# Altium PCB CellForge_PCB.PcbDoc (part 1 of 4)
Units mm, origin at the board's own origin, x right, y up, seen from the top; angles counter-clockwise.
Board outline 170.5 x 170.5 mm, 4 copper layers (Top Layer, Solid GND Plane, Power Distribution + signals, Bottom Layer), stack 1.586 mm thick; 199 components, 117 nets, 719 pads, 464 vias.
Unrouted connection lines stored in the file: 8.
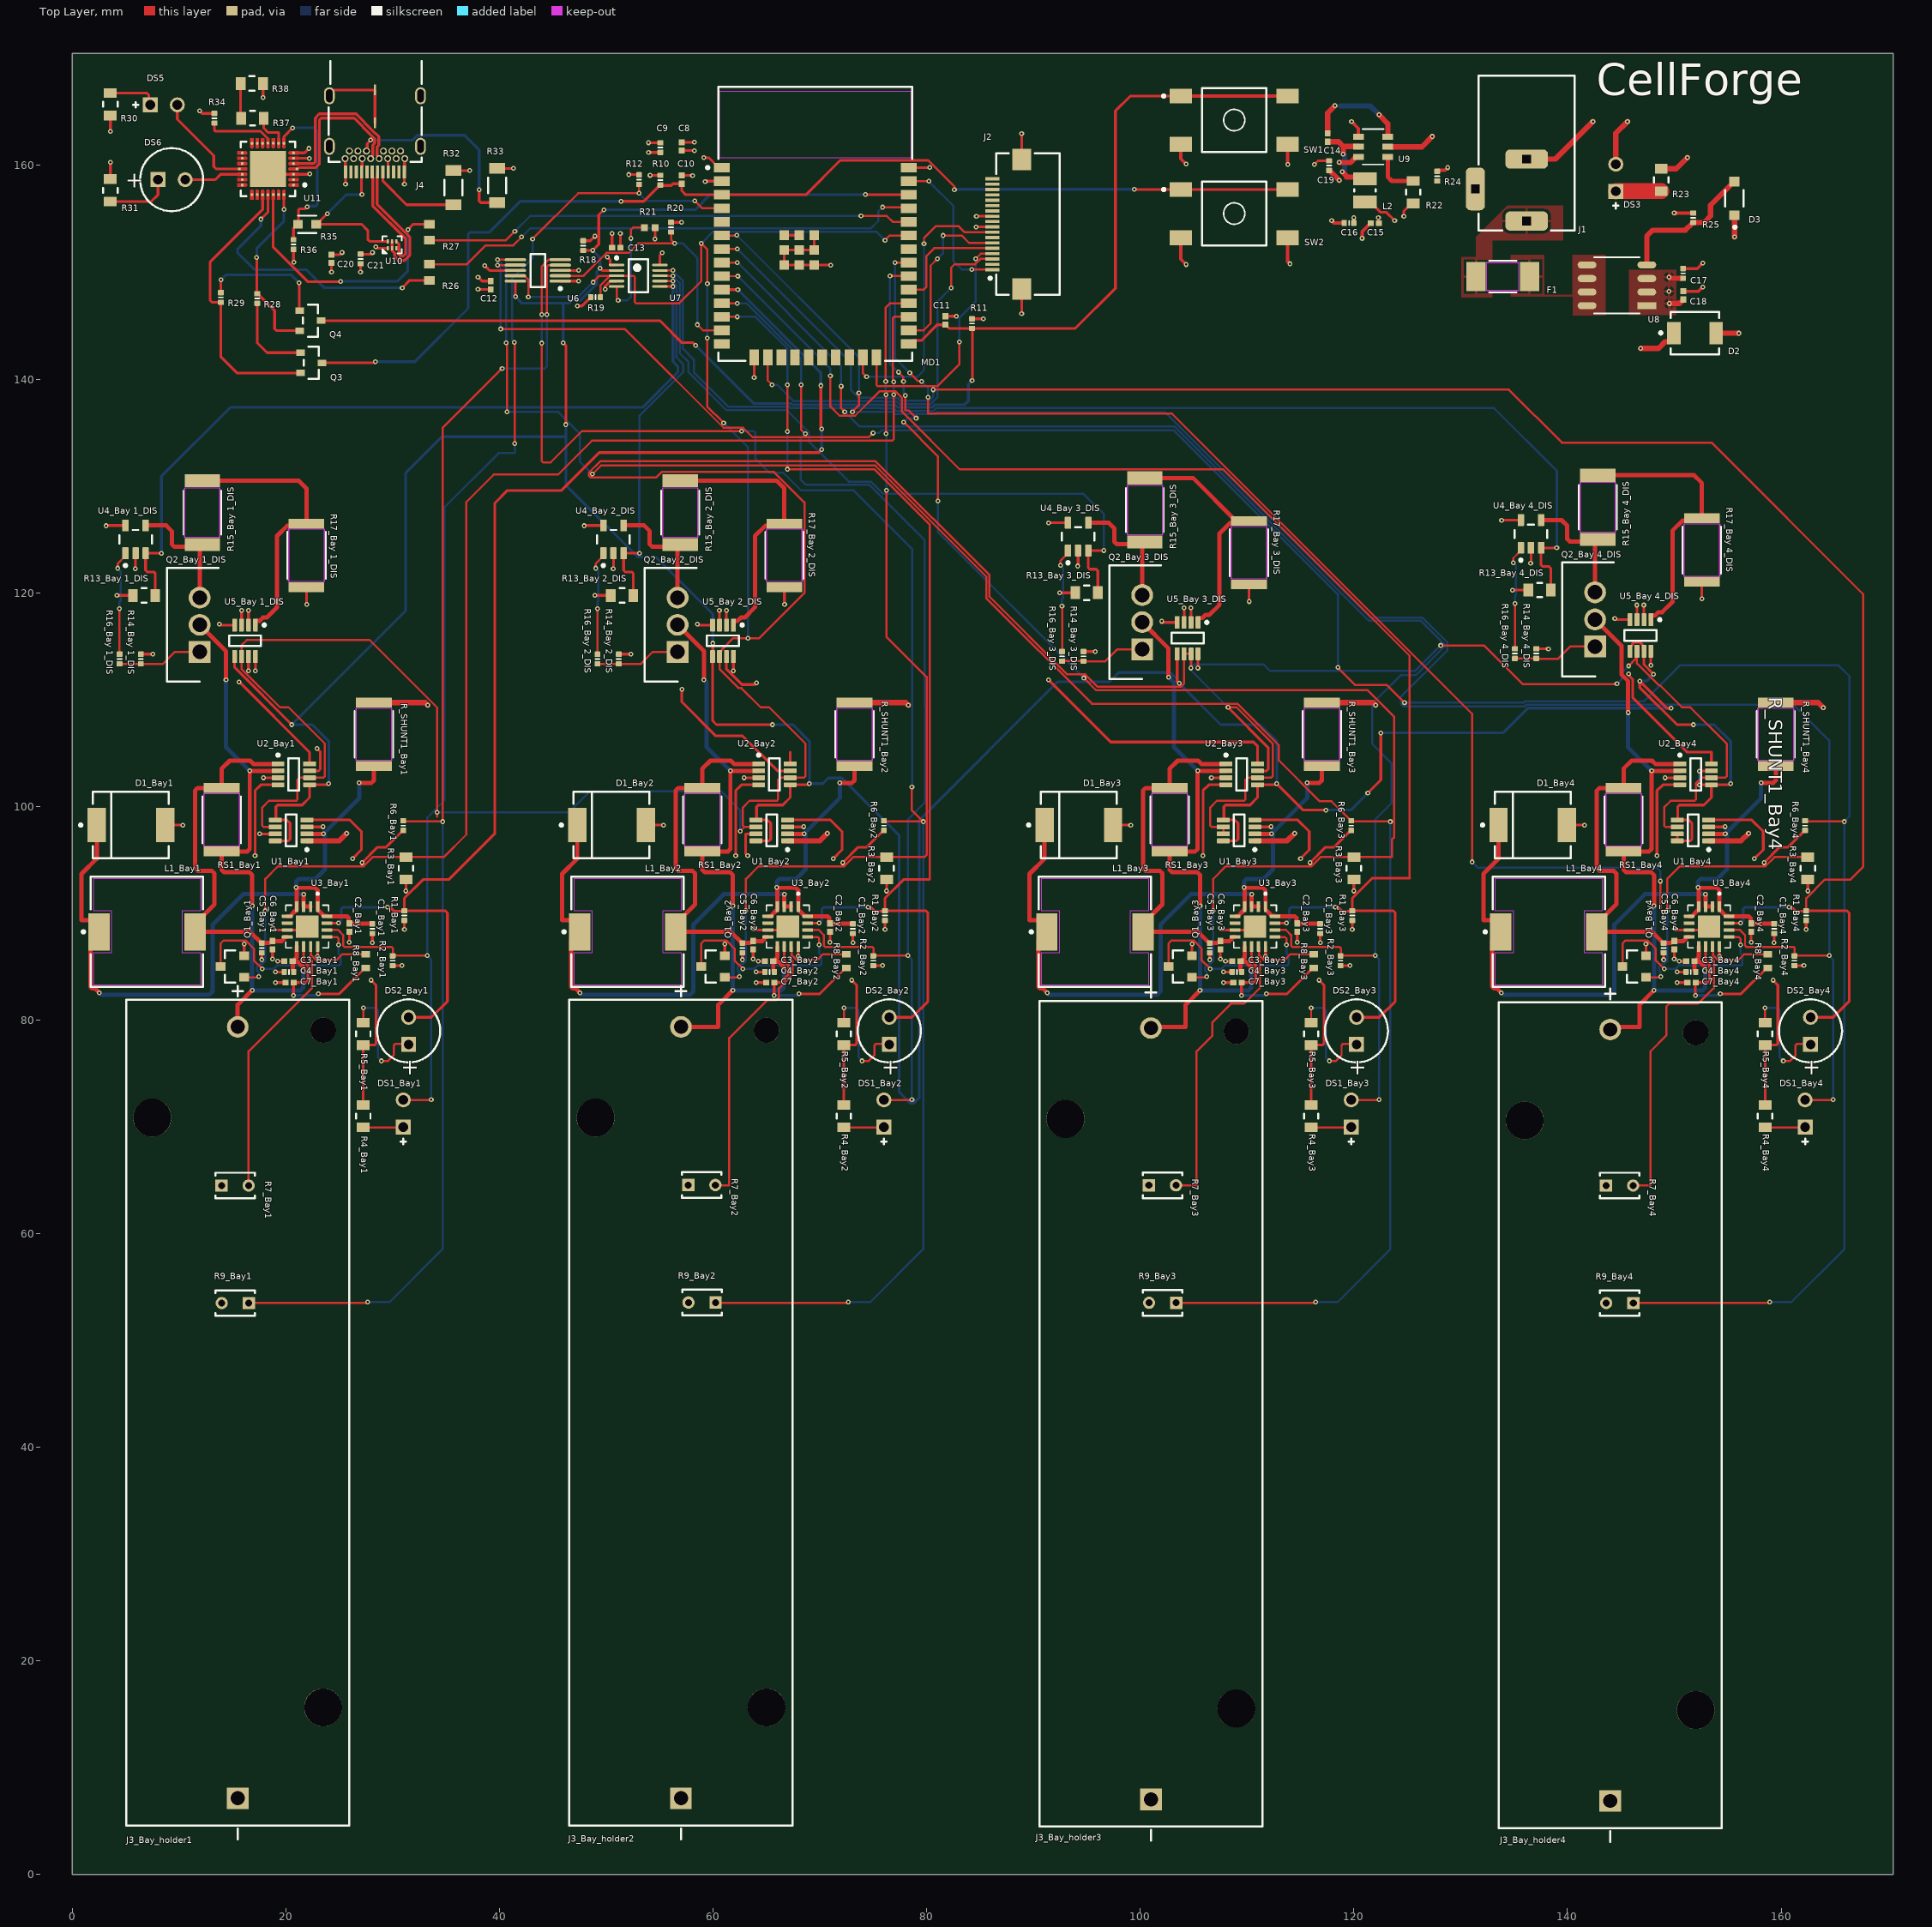
[diagram p0: Top Layer view]
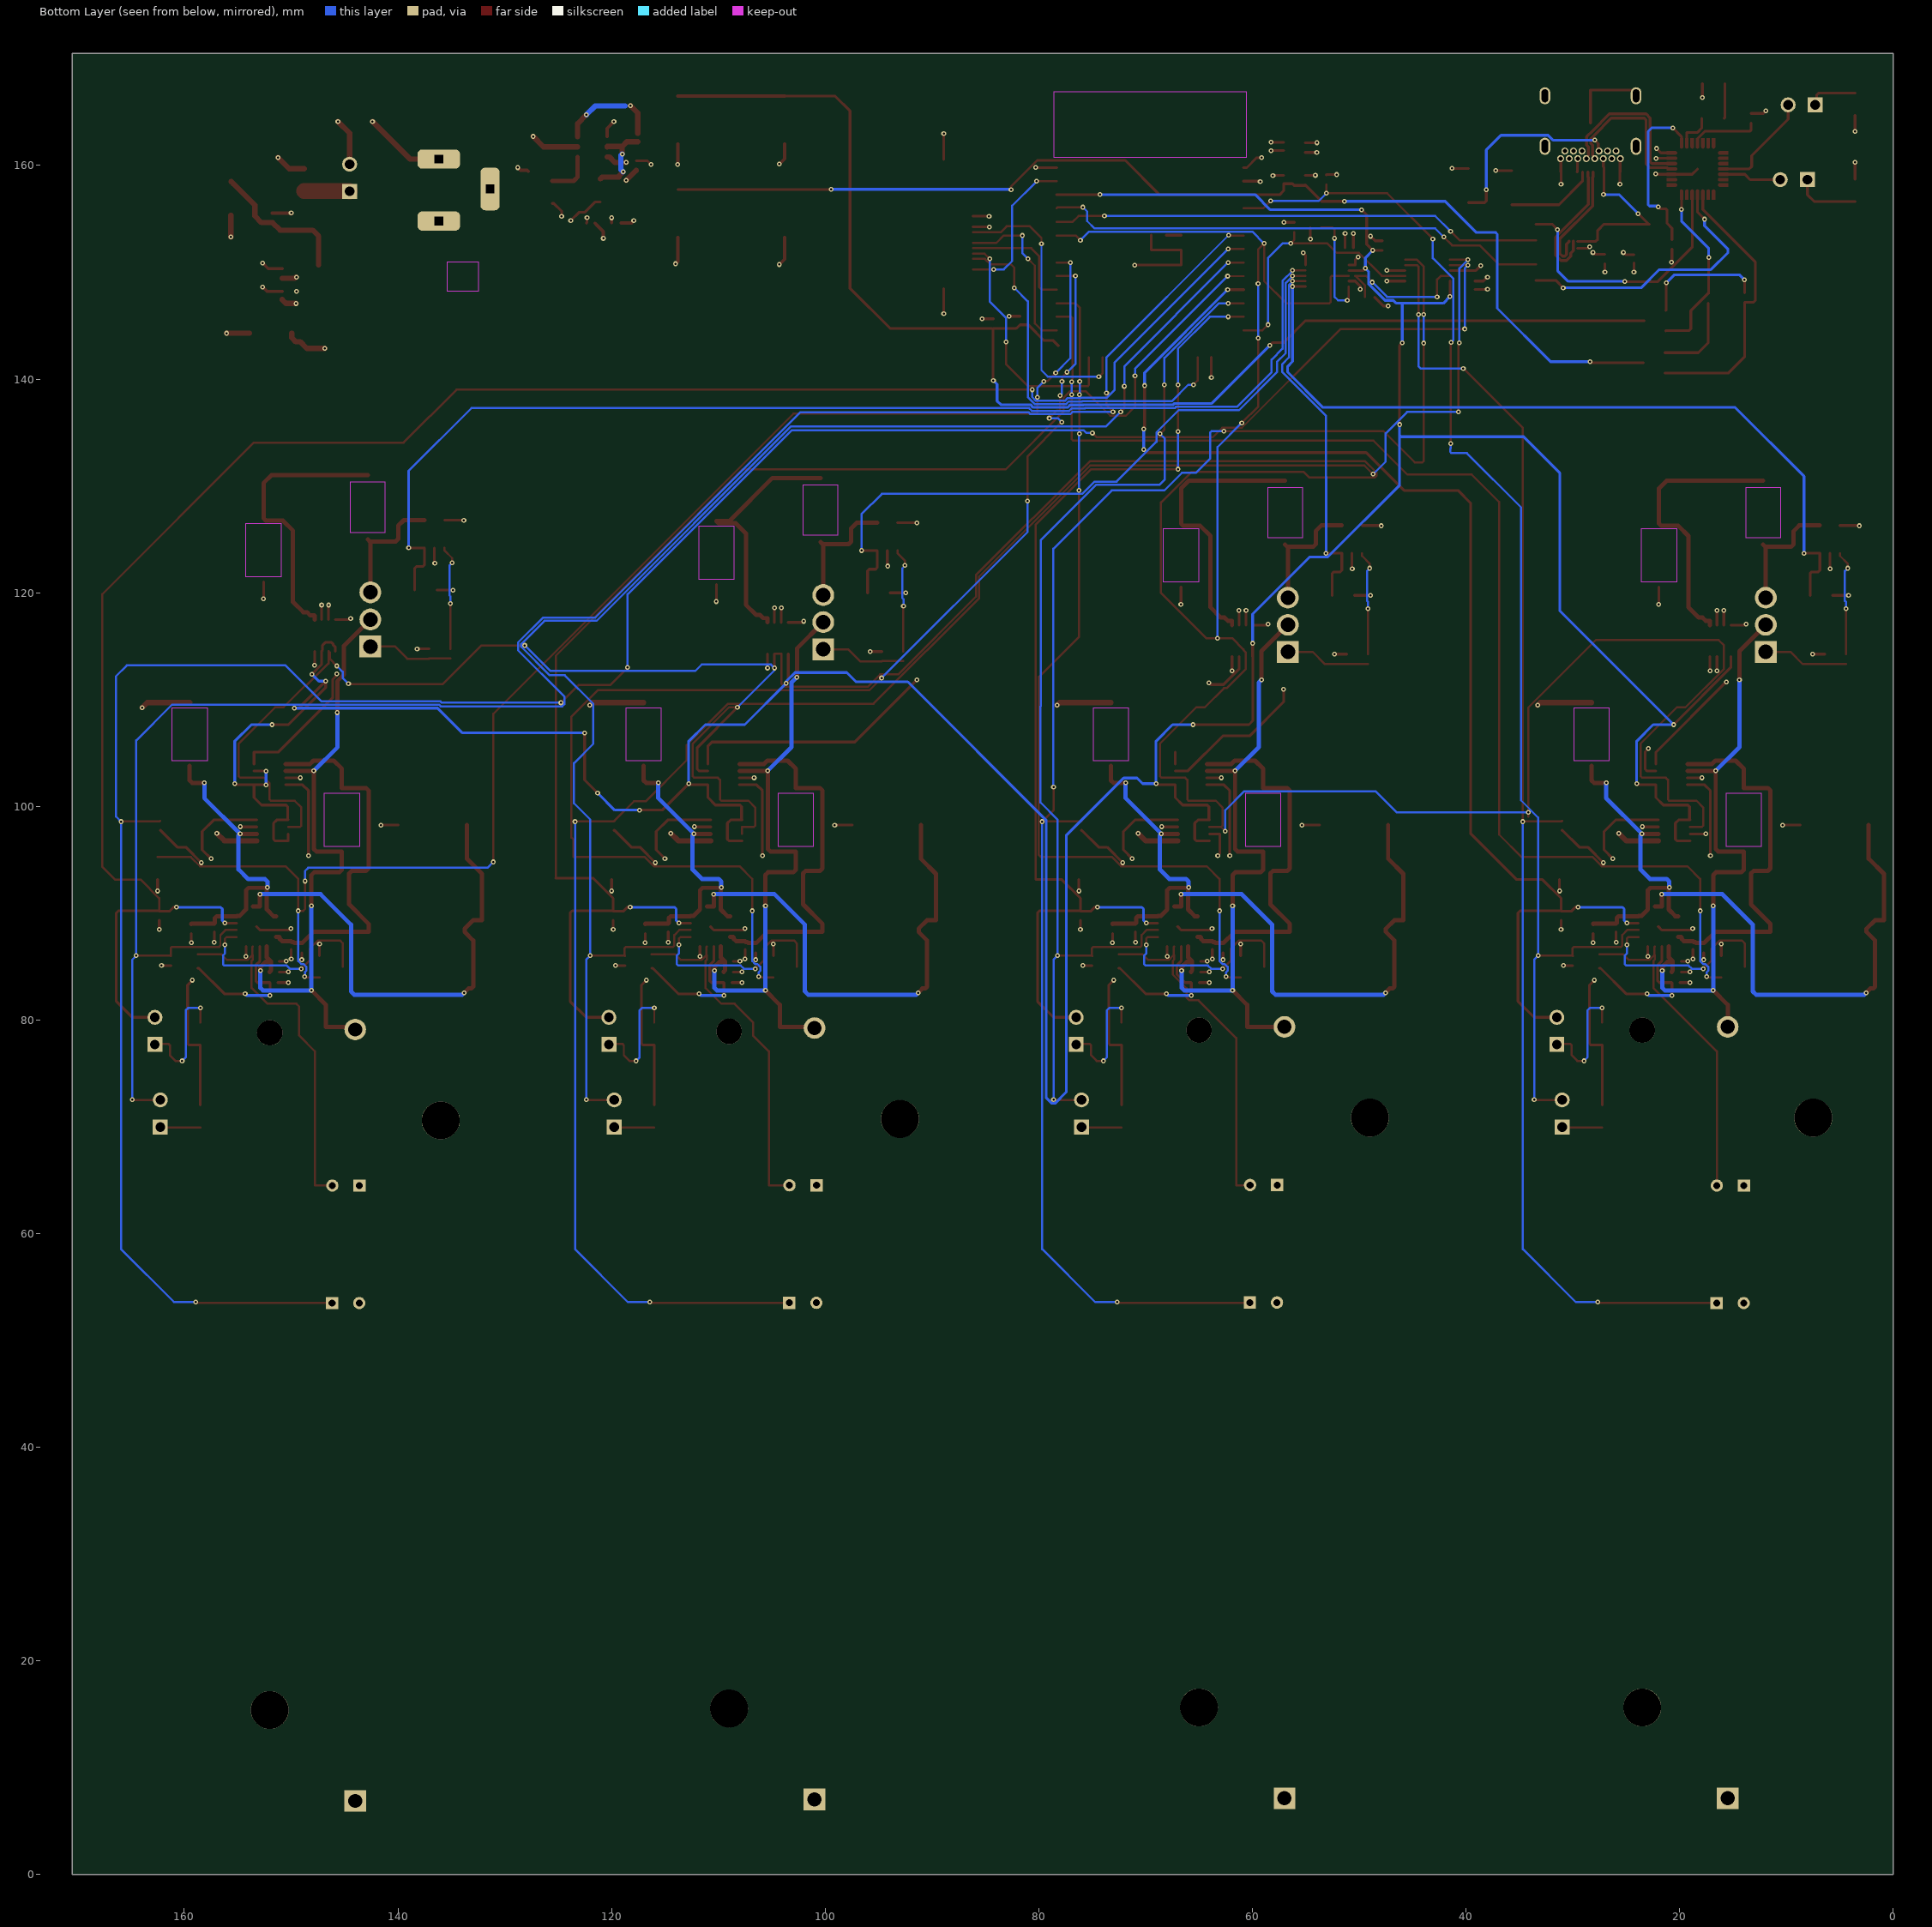
[diagram p1: Bottom Layer view, seen from below]
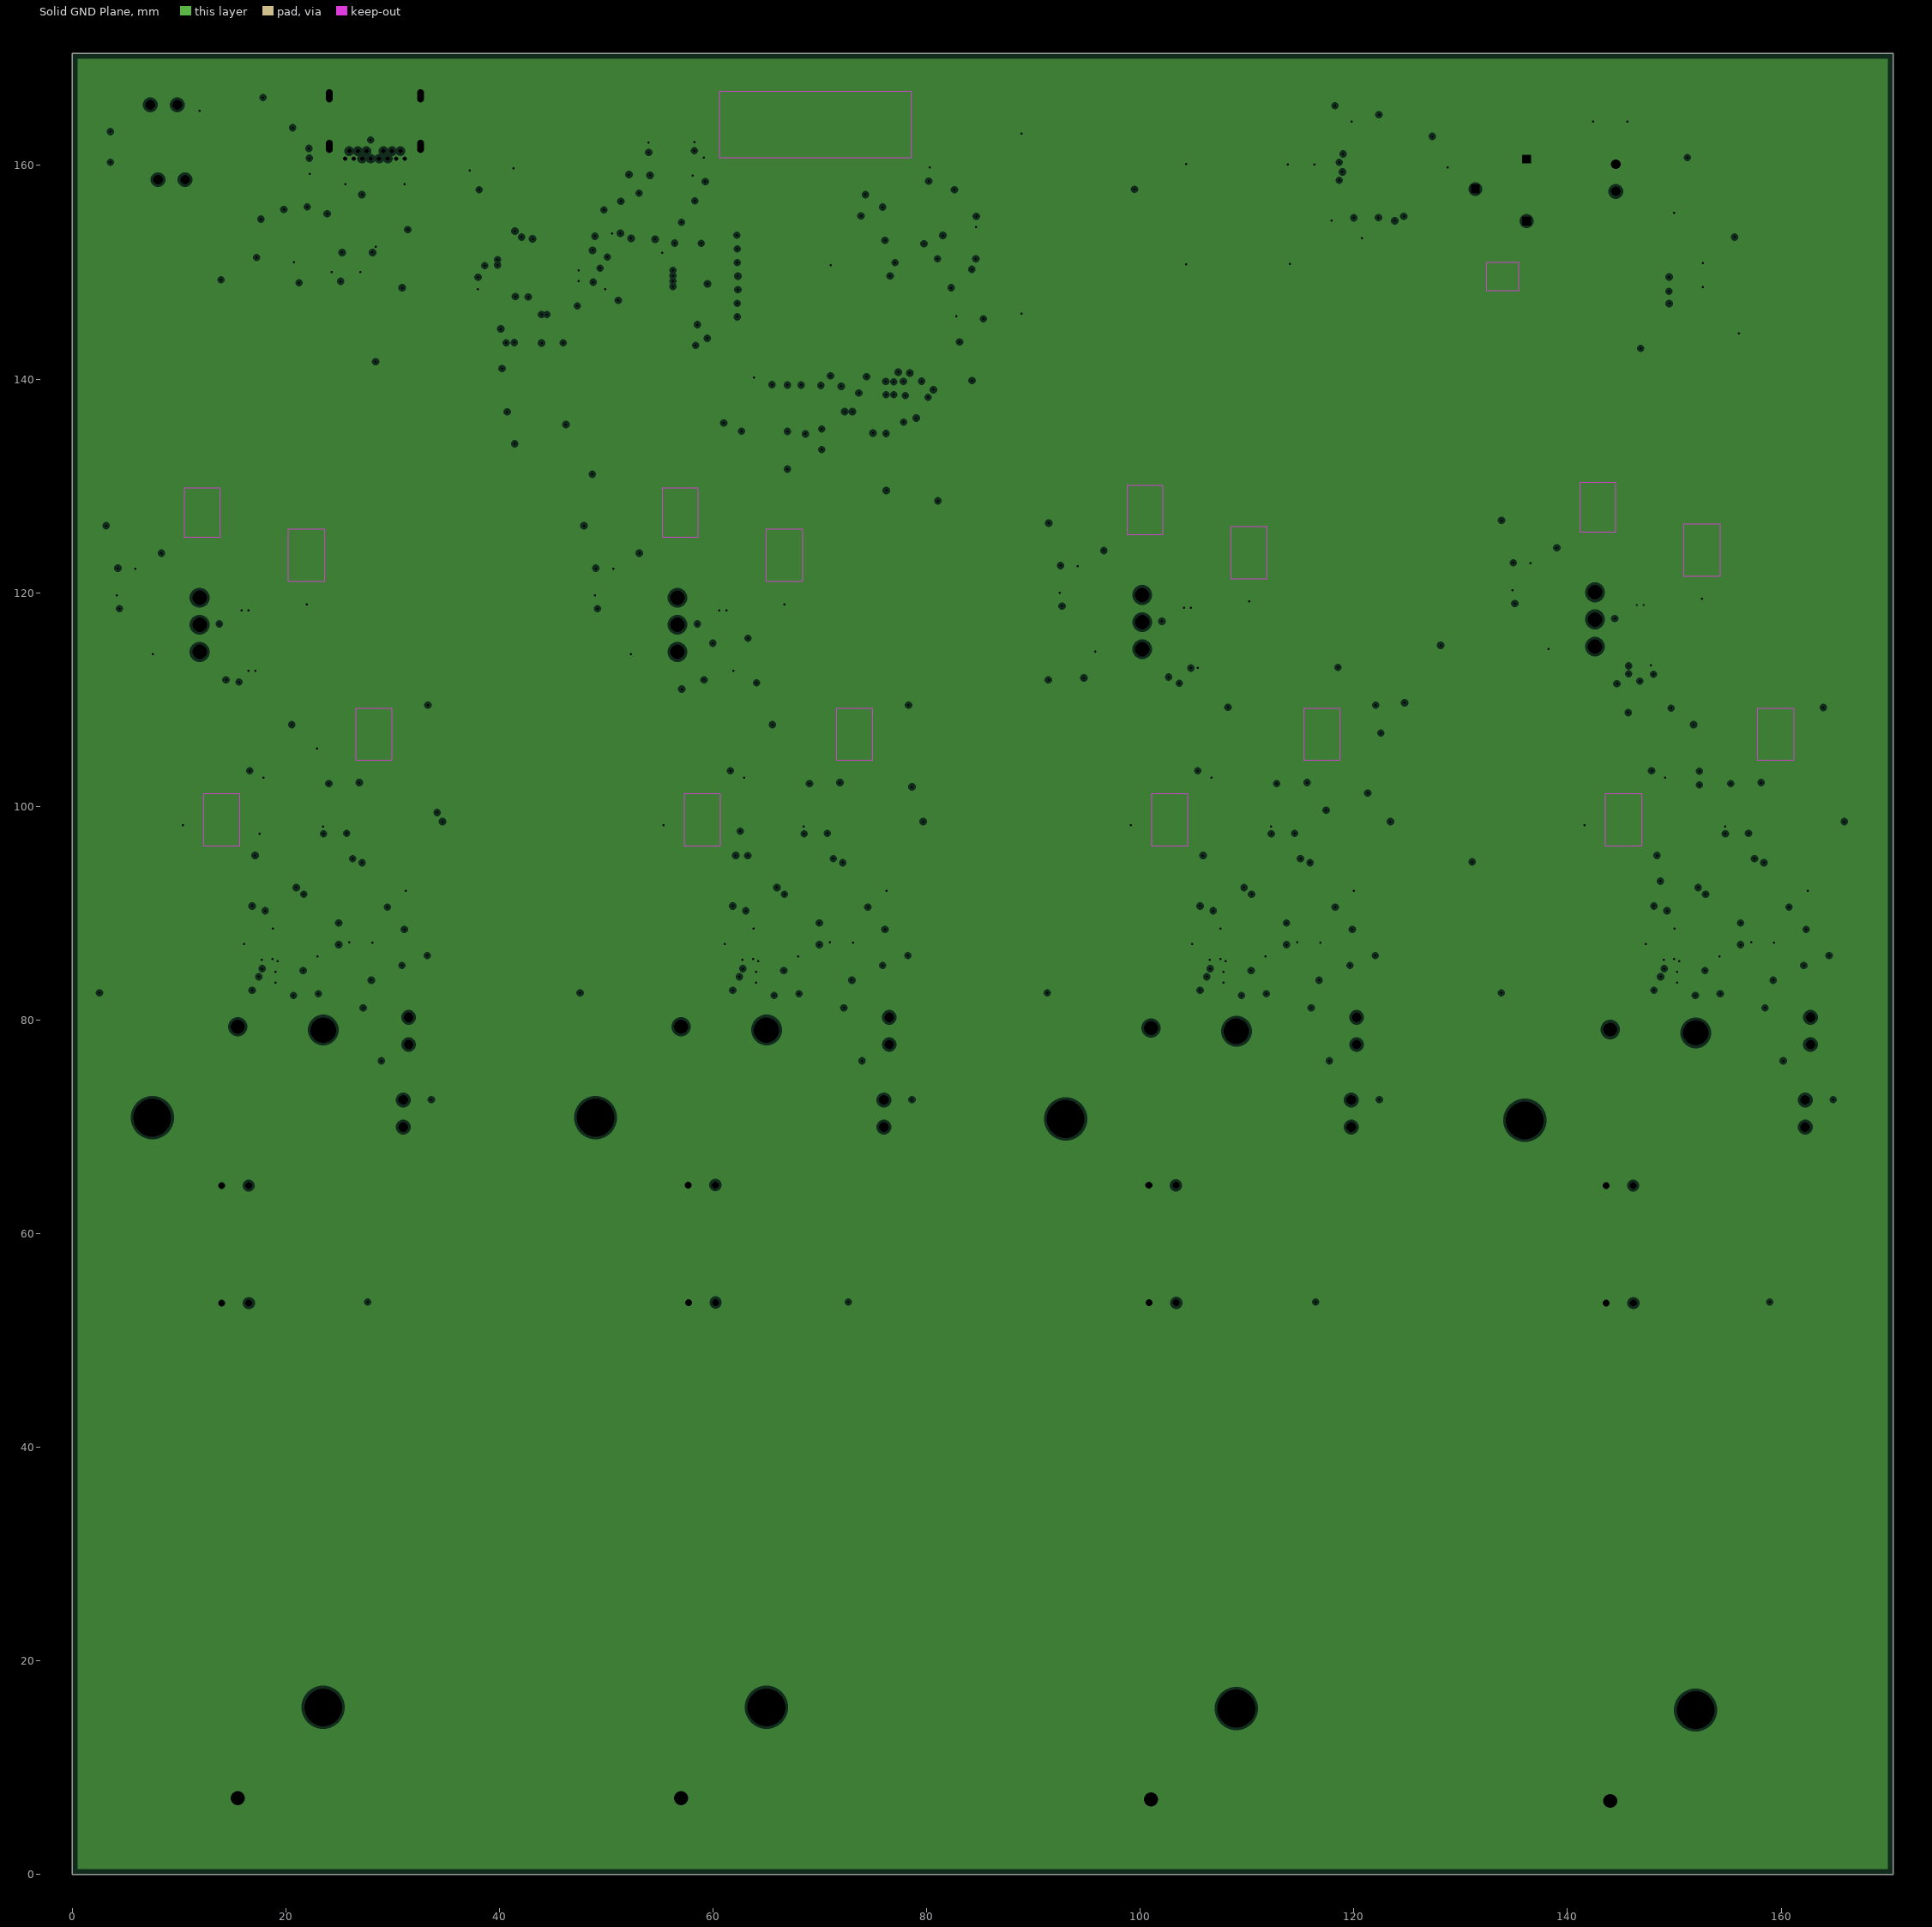
[diagram p2: Solid GND Plane, clearances drawn from the general rule]
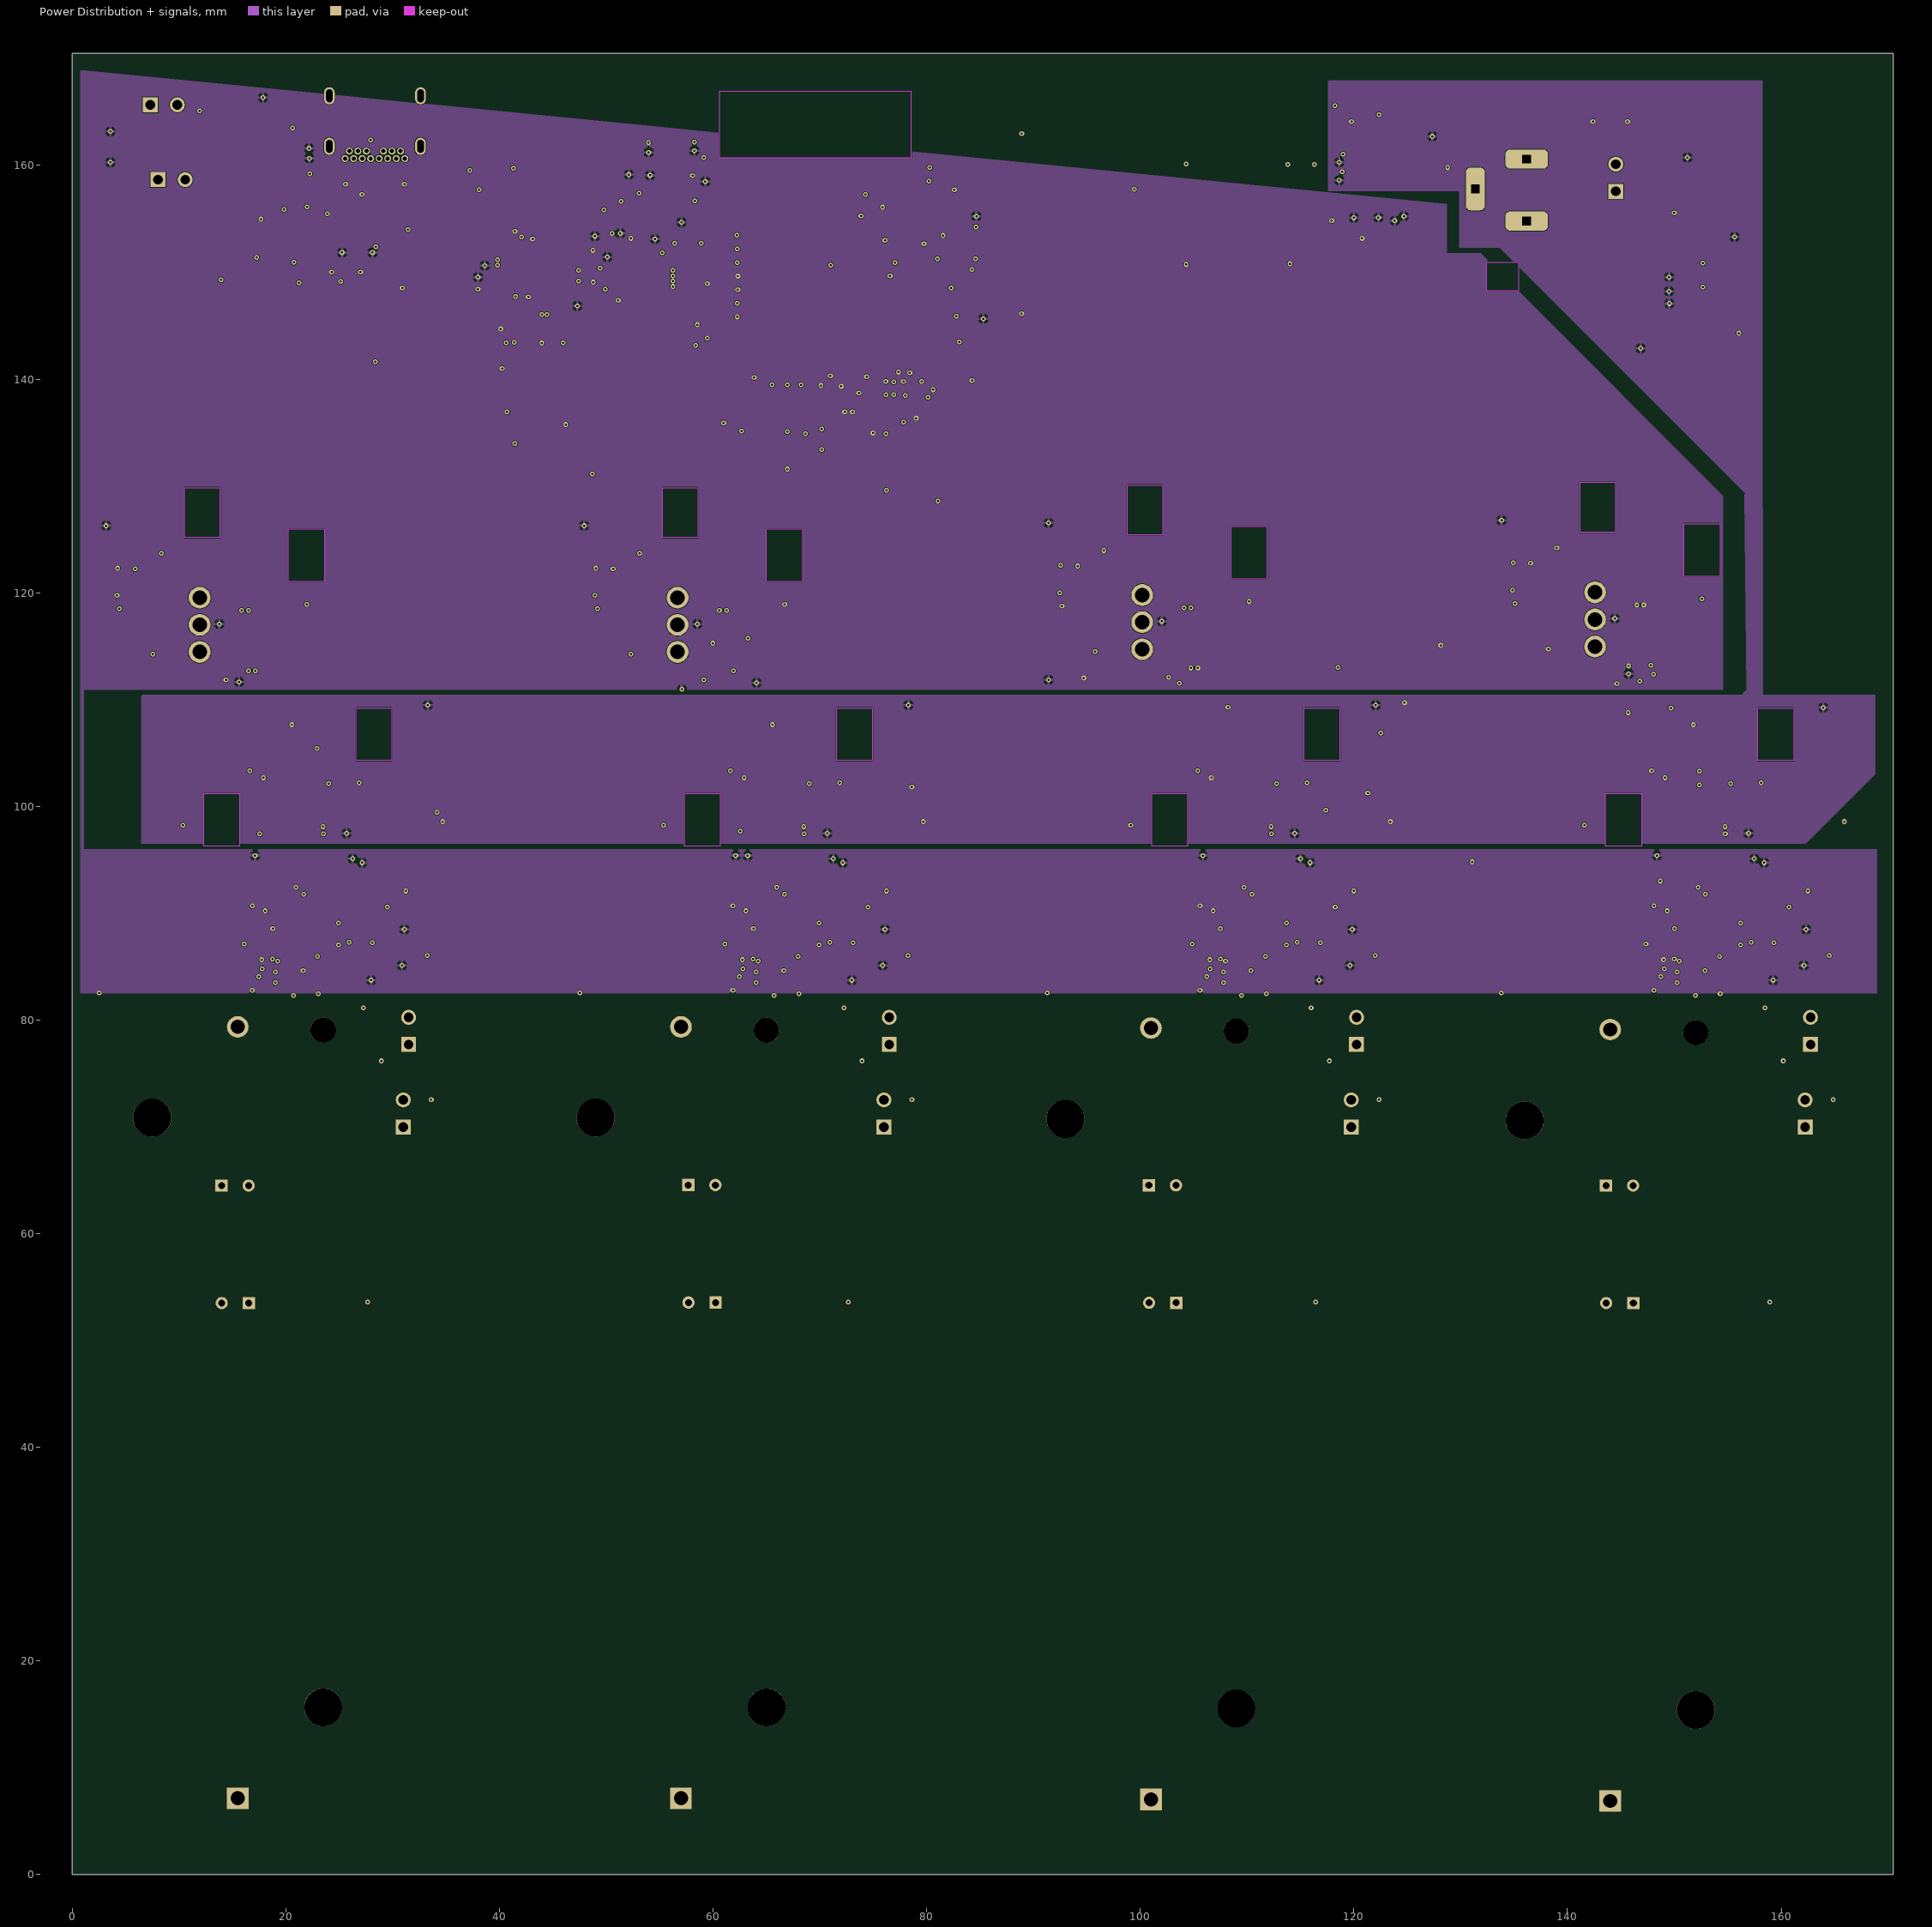
[diagram p3: Power Distribution + signals]
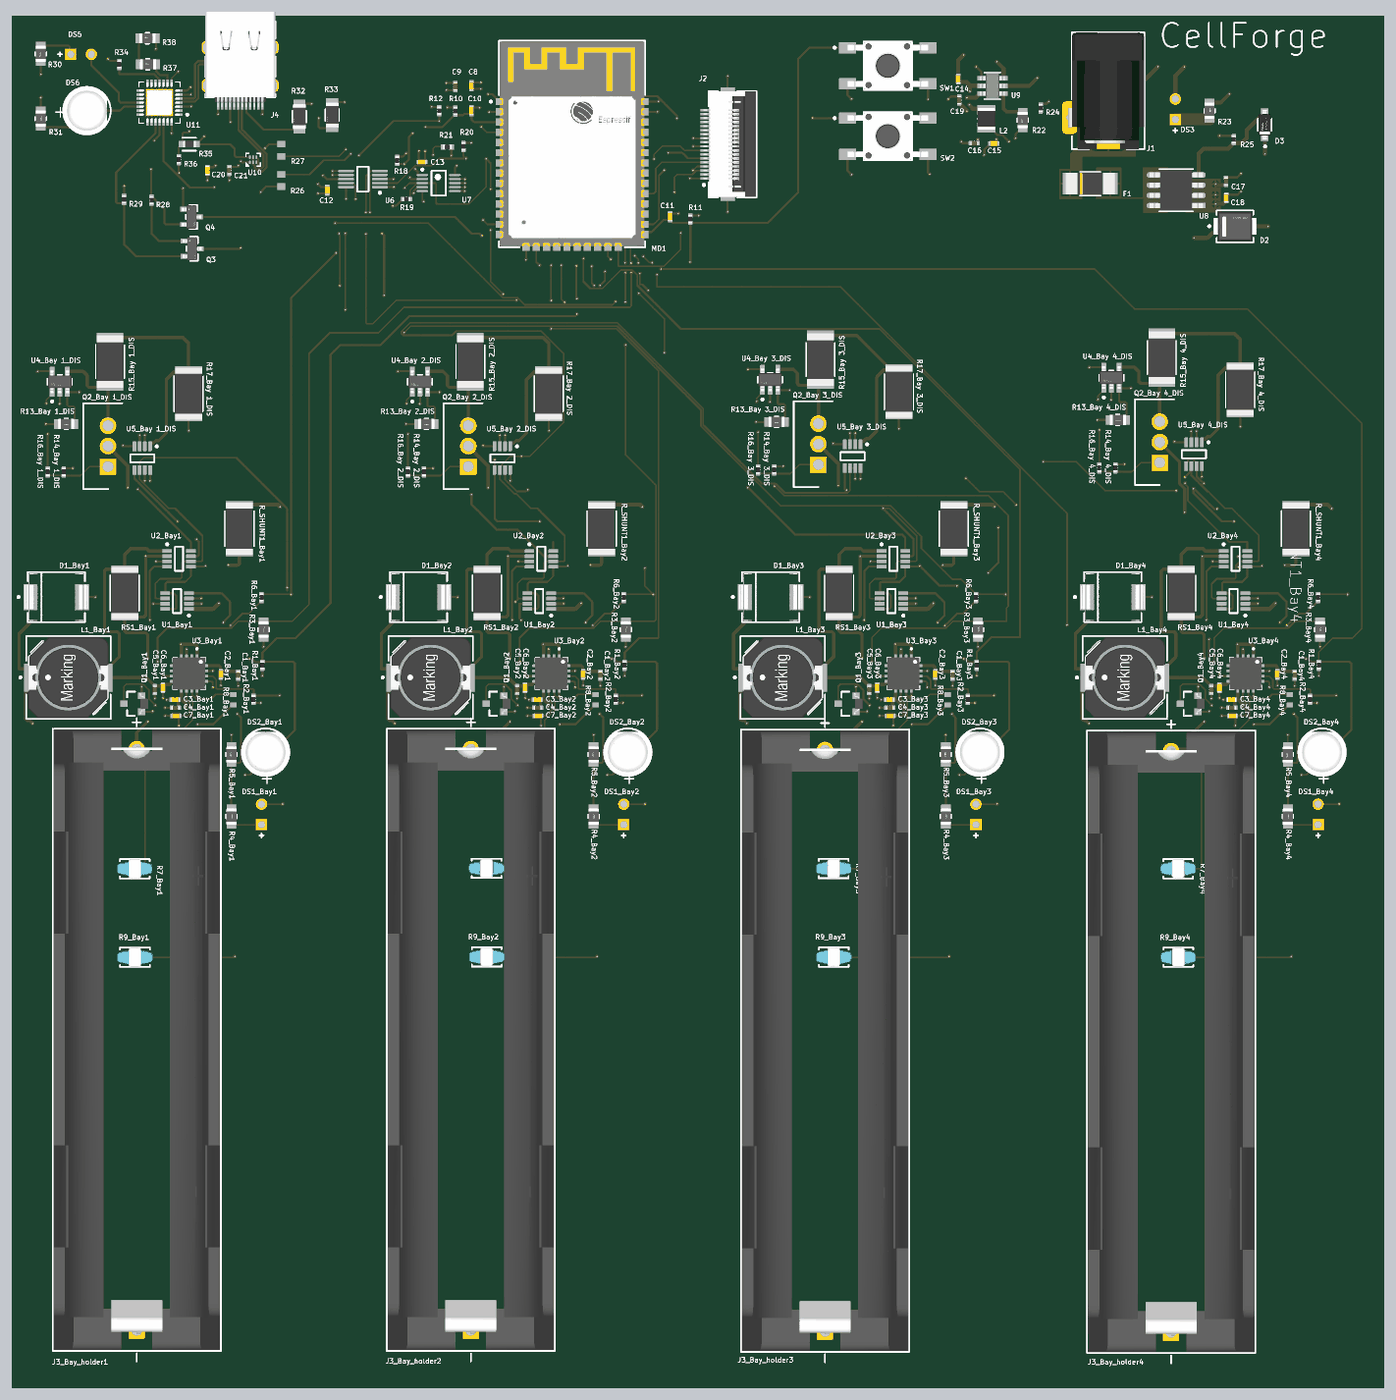
[diagram p6: 3D render of the assembled board from above, using the file's embedded part models]

## Layer stack, top to bottom
Top Solder: solder mask 0.0102, Solder Resist, Dk 3.8
Top Layer: signal copper 0.035
Dielectric 1: prepreg 0.2104, 7628 Prepeg, Dk 4.4
Solid GND Plane: plane copper 0.0152, net GND
Dielectric 2: core 1.065, JLCPCB FR4 Core, Dk 4.6
Power Distribution + signals: signal copper 0.0152
Dielectric 3: prepreg 0.2104, 7628 Prepeg, Dk 4.4
Bottom Layer: signal copper 0.035
Bottom Solder: solder mask 0.0102, Solder Resist, Dk 3.8

## Board outline
0,0 0,170.5 170.5,170.5 170.5,0

## Design rules (kind name [scope] priority, off if disabled: settings)
AssemblyTestPointUsage [All] p1: isadvanced=TRUE
AssemblyTestpoint [All] p1: isadvanced=TRUE testpointundercomponent=TRUE minsize=1.016 maxsize=2.54 preferedsize=1.524 minholesize=0 maxholesize=1.016 preferedholesize=0.813 testpointgrid=0.025 usegrid=TRUE gridtolerance=0 allowsidetop=TRUE allowsidebottom=TRUE
BoardOutlineClearance BoardOutlineClearance_1 [All] p1: isadvanced=TRUE gap=0.25 ignorepadtopadclearanceinfootprint=FALSE
Clearance Clearance_1 [All] p1: isadvanced=TRUE gap=0.05 ignorepadtopadclearanceinfootprint=FALSE
Clearance Clearance_1 [(ExistsOnLayer('Power Distribution + signals')) vs (ExistsOnLayer('Power Distribution + signals'))] p2: gap=0.1 ignorepadtopadclearanceinfootprint=TRUE sourcerule=61 cellrowname=All cellrowtype=0 cellcolname=All cellcoltype=0 innerlayers=TRUE
Clearance Clearance_2 [(ExistsOnLayer('Top Layer') Or ExistsOnLayer('Bottom Layer')) vs (ExistsOnLayer('Top Layer') Or ExistsOnLayer('Bottom Layer'))] p3: gap=0.1 ignorepadtopadclearanceinfootprint=TRUE sourcerule=61 cellrowname=All cellrowtype=0 cellcolname=All cellcoltype=0 outerlayers=TRUE
Clearance [All] p4: gap=0.254 ignorepadtopadclearanceinfootprint=TRUE ismatrix=TRUE
ComponentClearance [All] p1: isadvanced=TRUE gap=0.254 collisioncheckmode=3 verticalgap=0.254 showdistances=FALSE
DiffPairsRouting DifferentialPairsRouting_1 [InDifferentialPairClass('All Differential Pairs')] p1: maxlimit=0.254 minlimit=0.127 mostfreqgap=0.254 toplayer_maxgap=0.127 toplayer_prefgap=0.127 toplayer_minwidth=0.269 toplayer_maxwidth=0.269 toplayer_prefwidth=0.269 bottomlayer_maxgap=0.127 bottomlayer_prefgap=0.127 bottomlayer_minwidth=0.54 bottomlayer_maxwidth=0.54 bottomlayer_prefwidth=0.54 impedanceprofiledriven=TRUE impedanceprofileid={96032CBD-3DD1-4A5B-9169-1BD67DA0E782} impedanceprofilevalue=90.000000 maxuncoupledlength=12.7
DiffPairsRouting [All] p2: maxlimit=0.254 minlimit=0.254 mostfreqgap=0.254 toplayer_minwidth=0.381 toplayer_maxwidth=0.381 toplayer_prefwidth=0.381 midlayer1_minwidth=0.381 midlayer1_maxwidth=0.381 midlayer1_prefwidth=0.381 bottomlayer_minwidth=0.381 bottomlayer_maxwidth=0.381 bottomlayer_prefwidth=0.381 maxuncoupledlength=12.7
FabricationTestPointUsage [All] p1: isadvanced=TRUE valid=0 allowmultiple=FALSE
FabricationTestpoint [All] p1: isadvanced=TRUE side=3 testpointundercomponent=TRUE minsize=1.016 maxsize=2.54 preferedsize=1.524 minholesize=0 maxholesize=1.016 preferedholesize=0.813 testpointgrid=0.025 allowsidetop=TRUE allowsidebottom=TRUE usegrid=TRUE gridtolerance=0
FanoutControl Fanout_BGA [IsBGA] p1: isadvanced=TRUE bgadir=Out bgaviamode=Centered fanoutstyle=Auto fanoutdirection=Alternating viagrid=0.025 // Fanout_BGA (Default Rule)
FanoutControl Fanout_LCC [IsLCC] p2: isadvanced=TRUE bgadir=Out bgaviamode=Centered fanoutstyle=Auto fanoutdirection=Alternating viagrid=0.025 // Fanout_LCC (Default Rule)
FanoutControl Fanout_SOIC [IsSOIC] p3: isadvanced=TRUE bgadir=Out bgaviamode=Centered fanoutstyle=Auto fanoutdirection=Alternating viagrid=0.025 // Fanout_SOIC (Default Rule)
FanoutControl Fanout_Small [(CompPinCount < 5)] p4: isadvanced=TRUE bgadir=Out bgaviamode=Centered fanoutstyle=Auto fanoutdirection=OutThenIn viagrid=0.025 // Fanout_Small (Default Rule)
FanoutControl Fanout_Default [All] p5: isadvanced=TRUE bgadir=Out bgaviamode=Centered fanoutstyle=Auto fanoutdirection=Alternating viagrid=0.025 // Fanout_Default (Default Rule)
Height [All] p1: isadvanced=TRUE minheight=0 maxheight=25.4 prefheight=12.7
HoleSize [All] p1: isadvanced=TRUE absolutevalues=TRUE maxlimit=6.3 minlimit=0.2 maxpercent=80.000 minpercent=20.000
HoleToHoleClearance [All] p1: isadvanced=TRUE gap=0.25 allowstackedmicrovias=TRUE
LayerPairs [All] p1: isadvanced=TRUE enforce=TRUE
MinimumAnnularRing MinimumAnnularRing_1 [All] p1: isadvanced=TRUE minimumring=0.12
MinimumSolderMaskSliver [All] p1: isadvanced=TRUE minsoldermaskwidth=0.1
NetAntennae [All] p1: isadvanced=TRUE netantennaetolerance=0
PasteMaskExpansion [All] p1: isadvanced=TRUE expansion=0
PlaneClearance [All] p1: isadvanced=TRUE clearance=0.25
PlaneConnect [All] p1: isadvanced=TRUE planeconnectstyle=Relief reliefexpansion=0.508 reliefentries=4 reliefconductorwidth=0.254 reliefairgap=0.254
PolygonConnect PolygonConnectStyle_1 [InComponent('U8')] p1: isadvanced=TRUE connectstyle=Direct reliefconductorwidth=0.254 reliefentries=2 polygonreliefangle="0 Angle" airgapwidth=0.254
PolygonConnect [All] p2: connectstyle=Relief reliefconductorwidth=0.254 reliefentries=4 polygonreliefangle="90 Angle" airgapwidth=0.254
RoomDefinition "Bay 1_DIS" [InComponentClass('Bay 1_DIS')] p1: isadvanced=TRUE confinementstyle=ConfineIn formatcopy=FALSE lockcomponents=FALSE outline 0.35,140.5 0.35,111 25.75,111 25.75,140.5
RoomDefinition "Bay 2_DIS" [InComponentClass('Bay 2_DIS')] p2: isadvanced=TRUE confinementstyle=ConfineIn formatcopy=TRUE lockcomponents=FALSE outline 45.1,140.5 45.1,111 70.5,111 70.5,140.5
RoomDefinition Bay2 [InComponentClass('Bay2')] p3: isadvanced=TRUE confinementstyle=ConfineIn formatcopy=TRUE lockcomponents=FALSE outline 81.75,2.5 81.75,110.75 45,110.75 45,2.5
RoomDefinition Bay1 [InComponentClass('Bay1')] p4: isadvanced=TRUE confinementstyle=ConfineIn formatcopy=FALSE lockcomponents=FALSE outline 36.75,2.5 36.75,110.75 0,110.75 0,2.5
RoomDefinition Bay3 [InComponentClass('Bay3')] p5: isadvanced=TRUE confinementstyle=ConfineIn formatcopy=TRUE lockcomponents=FALSE outline 125.5,2.5 125.5,110.75 88.75,110.75 88.75,2.5
RoomDefinition Bay4 [InComponentClass('Bay4')] p6: isadvanced=TRUE confinementstyle=ConfineIn formatcopy=TRUE lockcomponents=FALSE outline 168,2.5 168,110.75 131.25,110.75 131.25,2.5
RoomDefinition "Bay 3_DIS" [InComponentClass('Bay 3_DIS')] p7: isadvanced=TRUE confinementstyle=ConfineIn formatcopy=TRUE lockcomponents=FALSE outline 88.6,140.75 88.6,111.25 114,111.25 114,140.75
RoomDefinition "Bay 4_DIS" [InComponentClass('Bay 4_DIS')] p8: isadvanced=TRUE confinementstyle=ConfineIn formatcopy=TRUE lockcomponents=FALSE outline 131,141 131,111.5 156.4,111.5 156.4,141
RoutingCorners [All] p1: isadvanced=TRUE cornerstyle=45-Degree minsetback=2.54 maxsetback=2.54
RoutingPriority [All] p1: isadvanced=TRUE routingpriority=0
RoutingVias RoutingViaStyle_1 [All] p1: isadvanced=TRUE holewidth=0.254 width=0.254 viastyle="Through Hole" minholewidth=0.254 minwidth=0.254 maxholewidth=0.254 maxwidth=0.254
RoutingVias RoutingViaStyle_2 [InNetClass('HIGH_CURRENT_12')] p2: holewidth=0.4 width=0.8 viastyle="Through Hole" minholewidth=0.4 minwidth=0.8 maxholewidth=0.4 maxwidth=0.8
RoutingVias RoutingViaStyle_3 [InNetClass('HIGH_CURRENT_BAY')] p3: holewidth=0.4 width=0.8 viastyle="Through Hole" minholewidth=0.4 minwidth=0.8 maxholewidth=0.4 maxwidth=0.8
RoutingVias RoutingViaStyle_4 [InNetClass('POWER_3V3')] p4: holewidth=0.4 width=0.8 viastyle="Through Hole" minholewidth=0.4 minwidth=0.8 maxholewidth=0.4 maxwidth=0.8
RoutingVias [All] p5: holewidth=0.3 width=0.6 viastyle="Through Hole" minholewidth=0.3 minwidth=0.6 maxholewidth=0.3 maxwidth=0.6
ShortCircuit [All] p1: isadvanced=TRUE allowed=FALSE
SilkToSilkClearance [All] p1: isadvanced=TRUE silktosilkclearance=0.15
SilkToSolderMaskClearance [IsPad] p1: isadvanced=TRUE minsilkscreentomaskgap=0.1 clearancetoexposedcopper=TRUE
SolderMaskExpansion [All] p1: isadvanced=TRUE expansion=0 istentingtop=FALSE
SupplyNets "Schematic Supply Nets_2" [InNet('+12')] p1: isadvanced=TRUE voltage=0.000
SupplyNets "Schematic Supply Nets_1" [InNet('GND')] p2: isadvanced=TRUE voltage=0.000
SupplyNets "Schematic Supply Nets" [InNet('3V3')] p3: isadvanced=TRUE voltage=0.000
UnRoutedNet [All] p1: isadvanced=TRUE
UnpouredPolygon [All] p1: isadvanced=TRUE
Width MaxMinWidth_1 [InNetClass('HIGH_CURRENT_12')] p1: maxlimit=4 minlimit=0.4 preferedwidth=2 minimp=50.000000 maximp=50.000000 favimp=50.000000
Width MaxMinWidth_2 [InNetClass('HIGH_CURRENT_BAY')] p2: maxlimit=5 minlimit=0.4 preferedwidth=1.5 minimp=50.000000 maximp=50.000000 favimp=50.000000
Width MaxMinWidth_3 [InNetClass('POWER_3V3')] p3: maxlimit=3 minlimit=0.25 preferedwidth=0.4 minimp=50.000000 maximp=50.000000 favimp=50.000000
Width MaxMinWidth_4 [InNetClass('SWITCHING_NODES')] p4: maxlimit=1.5 minlimit=0.4 preferedwidth=0.75 minimp=50.000000 maximp=50.000000 favimp=50.000000
Width MaxMinWidth_5 [InNetClass('DIGITAL_SIGNALS')] p5: maxlimit=0.3 minlimit=0.127 preferedwidth=0.2 minimp=50.000000 maximp=50.000000 favimp=50.000000
Width [All] p6: maxlimit=0.3 minlimit=0.15 preferedwidth=0.2 minimp=50.000000 maximp=50.000000 favimp=50.000000
3 further rules are at their usual default settings.

## Classes and differential pairs
net class NORMAL_NET: "gate_vout_Bay 1_DIS" "gate_vout_Bay 2_DIS" "gate_vout_Bay 3_DIS" "gate_vout_Bay 4_DIS" NetC7_Bay1_1 NetC7_Bay2_1 NetC7_Bay3_1 NetC7_Bay4_1 NetDS1_Bay1_1 NetDS1_Bay2_1 NetDS1_Bay3_1 NetDS1_Bay4_1 NetDS2_Bay1_1 NetDS2_Bay2_1 NetDS2_Bay3_1 NetDS2_Bay4_1 NetDS3_1 NetDS5_1 NetDS5_2 NetDS6_1 NetDS6_2 NetR7_Bay1_2 NetR7_Bay2_2 NetR7_Bay3_2 NetR7_Bay4_2 "NetR16_Bay 1_DIS_1" "NetR16_Bay 2_DIS_1" "NetR16_Bay 3_DIS_1" "NetR16_Bay 4_DIS_1" NetR34_1 NetR35_1 NetR37_1 NetR37_2
net class SWITCHING_NODES: BUCK_SW_PIN NetC14_1 NetD1_Bay1_1 NetD1_Bay2_1 NetD1_Bay3_1 NetD1_Bay4_1 NetR22_2 VS_PIN_Bay1 VS_PIN_Bay2 VS_PIN_Bay3 VS_PIN_Bay4
net class HIGH_CURRENT_12: +12 NetC1_Bay1_1 NetC1_Bay2_1 NetC1_Bay3_1 NetC1_Bay4_1 NetD3_2 NetF1_1 NetF1_2
net class ANALOG_SENSE: opIN_1 opIN_2 opIN_3 opIN_4 THERM_ADC1 THERM_ADC2 THERM_ADC3 THERM_ADC4
net class DIGITAL_SIGNALS: BAT_A0_3 BAT_A0_4 CS_MODE_Bay1 CS_MODE_Bay2 CS_MODE_Bay3 CS_MODE_Bay4 DIS_DAC_RDY DTR ESP32_EN_UART IO0_UART MCU_MODE_EN1 MCU_MODE_EN2 MCU_MODE_EN3 MCU_MODE_EN4 MCU_STBY1 MCU_STBY2 MCU_STBY3 MCU_STBY4 NetJ2_1 NetJ2_3 NetJ2_4 NetJ2_5 NetJ2_6 NetJ2_8 NetJ4_A5 NetJ4_B5 NetQ3_1 NetQ4_1 RTS RXD RXD0_UART SCRN_SDCS SCRN_SPI_MISO THERM_ADC_RDY TXD TXD0_UART
net class USB_DATA: D+ D-
net class HIGH_CURRENT_BAY: CELL_POS1 CELL_POS2 CELL_POS3 CELL_POS4 "NetQ2_Bay 1_DIS_3" "NetQ2_Bay 2_DIS_3" "NetQ2_Bay 3_DIS_3" "NetQ2_Bay 4_DIS_3" "NetR15_Bay 1_DIS_2" "NetR15_Bay 2_DIS_2" "NetR15_Bay 3_DIS_2" "NetR15_Bay 4_DIS_2" VBUS
net class POWER_3V3: 3V3
net class GND: GND
channel class TP5100_Sch: Bay1 Bay2 Bay3 Bay4
channel class Discharge_circuit: "Bay 1_DIS" "Bay 2_DIS" "Bay 3_DIS" "Bay 4_DIS"
channel class Bay_holder: Bay_holder1 Bay_holder2 Bay_holder3 Bay_holder4
component class USB_to_UART: C20 C21 DS5 DS6 J4 Q3 Q4 R26 R27 R28 R29 R30 R31 R32 R33 R34 R35 R36 R37 R38 SW1 SW2 U10 U11
component class "Power Distribution": C14 C15 C16 C17 C18 C19 D2 D3 DS3 F1 J1 L2 R22 R23 R24 R25 U8 U9
component class Main: C12 C13 R18 R19 R20 R21 U6 U7
component class ESP32: C8 C9 C10 C11 MD1 R10 R11 R12
component class Designator: J2
component class Bay_holder4: J3_Bay_holder4
component class Bay_holder3: J3_Bay_holder3
component class Bay_holder2: J3_Bay_holder2
component class Bay_holder1: J3_Bay_holder1
component class "Bay 4_DIS": "Q2_Bay 4_DIS" "R13_Bay 4_DIS" "R14_Bay 4_DIS" "R15_Bay 4_DIS" "R16_Bay 4_DIS" "R17_Bay 4_DIS" "U4_Bay 4_DIS" "U5_Bay 4_DIS"
component class "Bay 3_DIS": "Q2_Bay 3_DIS" "R13_Bay 3_DIS" "R14_Bay 3_DIS" "R15_Bay 3_DIS" "R16_Bay 3_DIS" "R17_Bay 3_DIS" "U4_Bay 3_DIS" "U5_Bay 3_DIS"
component class "Bay 2_DIS": "Q2_Bay 2_DIS" "R13_Bay 2_DIS" "R14_Bay 2_DIS" "R15_Bay 2_DIS" "R16_Bay 2_DIS" "R17_Bay 2_DIS" "U4_Bay 2_DIS" "U5_Bay 2_DIS"
component class "Bay 1_DIS": "Q2_Bay 1_DIS" "R13_Bay 1_DIS" "R14_Bay 1_DIS" "R15_Bay 1_DIS" "R16_Bay 1_DIS" "R17_Bay 1_DIS" "U4_Bay 1_DIS" "U5_Bay 1_DIS"
component class Bay4: C1_Bay4 C2_Bay4 C3_Bay4 C4_Bay4 C5_Bay4 C6_Bay4 C7_Bay4 D1_Bay4 DS1_Bay4 DS2_Bay4 L1_Bay4 Q1_Bay4 R1_Bay4 R2_Bay4 R3_Bay4 R4_Bay4 R5_Bay4 R6_Bay4 R7_Bay4 R8_Bay4 R9_Bay4 R_SHUNT1_Bay4 RS1_Bay4 U1_Bay4 U2_Bay4 U3_Bay4
component class Bay3: C1_Bay3 C2_Bay3 C3_Bay3 C4_Bay3 C5_Bay3 C6_Bay3 C7_Bay3 D1_Bay3 DS1_Bay3 DS2_Bay3 L1_Bay3 Q1_Bay3 R1_Bay3 R2_Bay3 R3_Bay3 R4_Bay3 R5_Bay3 R6_Bay3 R7_Bay3 R8_Bay3 R9_Bay3 R_SHUNT1_Bay3 RS1_Bay3 U1_Bay3 U2_Bay3 U3_Bay3
component class Bay2: C1_Bay2 C2_Bay2 C3_Bay2 C4_Bay2 C5_Bay2 C6_Bay2 C7_Bay2 D1_Bay2 DS1_Bay2 DS2_Bay2 L1_Bay2 Q1_Bay2 R1_Bay2 R2_Bay2 R3_Bay2 R4_Bay2 R5_Bay2 R6_Bay2 R7_Bay2 R8_Bay2 R9_Bay2 R_SHUNT1_Bay2 RS1_Bay2 U1_Bay2 U2_Bay2 U3_Bay2
component class Bay1: C1_Bay1 C2_Bay1 C3_Bay1 C4_Bay1 C5_Bay1 C6_Bay1 C7_Bay1 D1_Bay1 DS1_Bay1 DS2_Bay1 L1_Bay1 Q1_Bay1 R1_Bay1 R2_Bay1 R3_Bay1 R4_Bay1 R5_Bay1 R6_Bay1 R7_Bay1 R8_Bay1 R9_Bay1 R_SHUNT1_Bay1 RS1_Bay1 U1_Bay1 U2_Bay1 U3_Bay1
differential pair D: +D+ -D-

## Components (designator, comment, footprint, x,y, rotation, side; value= is the part's Value field where it differs from the comment)
C1_Bay1 "Capacitor 10µF +/-40% 6.3V 0402" CAPC0402(1005)60_L 28.1,88.55 r270 top value=10µF (schematic designator C1)
C1_Bay2 "Capacitor 10µF +/-40% 6.3V 0402" CAPC0402(1005)60_L 73.1,88.55 r270 top value=10µF (schematic designator C1)
C1_Bay3 "Capacitor 10µF +/-40% 6.3V 0402" CAPC0402(1005)60_L 116.85,88.55 r270 top value=10µF (schematic designator C1)
C1_Bay4 "Capacitor 10µF +/-40% 6.3V 0402" CAPC0402(1005)60_L 159.35,88.55 r270 top value=10µF (schematic designator C1)
C2_Bay1 "Capacitor 0.1 uF +/- 5% 16 V 0402" CAPC1005X56X25LL10T15 25.95,88.65 r270 top value=100nF (schematic designator C2)
C2_Bay2 "Capacitor 0.1 uF +/- 5% 16 V 0402" CAPC1005X56X25LL10T15 70.95,88.65 r270 top value=100nF (schematic designator C2)
C2_Bay3 "Capacitor 0.1 uF +/- 5% 16 V 0402" CAPC1005X56X25LL10T15 114.7,88.65 r270 top value=100nF (schematic designator C2)
C2_Bay4 "Capacitor 0.1 uF +/- 5% 16 V 0402" CAPC1005X56X25LL10T15 157.2,88.65 r270 top value=100nF (schematic designator C2)
C3_Bay1 "Capacitor 0.1 uF +/- 5% 16 V 0402" CAPC1005X56X25LL10T15 20.25,85.5 r180 top value=100nF (schematic designator C3)
C3_Bay2 "Capacitor 0.1 uF +/- 5% 16 V 0402" CAPC1005X56X25LL10T15 65.25,85.5 r180 top value=100nF (schematic designator C3)
C3_Bay3 "Capacitor 0.1 uF +/- 5% 16 V 0402" CAPC1005X56X25LL10T15 109,85.5 r180 top value=100nF (schematic designator C3)
C3_Bay4 "Capacitor 0.1 uF +/- 5% 16 V 0402" CAPC1005X56X25LL10T15 151.5,85.5 r180 top value=100nF (schematic designator C3)
C4_Bay1 "Capacitor 10µF +/-40% 6.3V 0402" CAPC0402(1005)60_L 20.3,84.5 r180 top value=10µF (schematic designator C4)
C4_Bay2 "Capacitor 10µF +/-40% 6.3V 0402" CAPC0402(1005)60_L 65.3,84.5 r180 top value=10µF (schematic designator C4)
C4_Bay3 "Capacitor 10µF +/-40% 6.3V 0402" CAPC0402(1005)60_L 109.05,84.5 r180 top value=10µF (schematic designator C4)
C4_Bay4 "Capacitor 10µF +/-40% 6.3V 0402" CAPC0402(1005)60_L 151.55,84.5 r180 top value=10µF (schematic designator C4)
C5_Bay1 "Capacitor 10µF +/-40% 6.3V 0402" CAPC0402(1005)60_L 17.75,86.75 r270 top value=10µF (schematic designator C5)
C5_Bay2 "Capacitor 10µF +/-40% 6.3V 0402" CAPC0402(1005)60_L 62.75,86.75 r270 top value=10µF (schematic designator C5)
C5_Bay3 "Capacitor 10µF +/-40% 6.3V 0402" CAPC0402(1005)60_L 106.5,86.75 r270 top value=10µF (schematic designator C5)
C5_Bay4 "Capacitor 10µF +/-40% 6.3V 0402" CAPC0402(1005)60_L 149,86.75 r270 top value=10µF (schematic designator C5)
C6_Bay1 "Capacitor 0.1 uF +/- 5% 16 V 0402" CAPC1005X56X25LL10T15 18.75,87 r270 top value=100nF (schematic designator C6)
C6_Bay2 "Capacitor 0.1 uF +/- 5% 16 V 0402" CAPC1005X56X25LL10T15 63.75,87 r270 top value=100nF (schematic designator C6)
C6_Bay3 "Capacitor 0.1 uF +/- 5% 16 V 0402" CAPC1005X56X25LL10T15 107.5,87 r270 top value=100nF (schematic designator C6)
C6_Bay4 "Capacitor 0.1 uF +/- 5% 16 V 0402" CAPC1005X56X25LL10T15 150,87 r270 top value=100nF (schematic designator C6)
C7_Bay1 "Capacitor 0.1 uF +/- 5% 16 V 0402" CAPC1005X56X25LL10T15 20.36,83.5 r180 top value=100nF (schematic designator C7)
C7_Bay2 "Capacitor 0.1 uF +/- 5% 16 V 0402" CAPC1005X56X25LL10T15 65.36,83.5 r180 top value=100nF (schematic designator C7)
C7_Bay3 "Capacitor 0.1 uF +/- 5% 16 V 0402" CAPC1005X56X25LL10T15 109.11,83.5 r180 top value=100nF (schematic designator C7)
C7_Bay4 "Capacitor 0.1 uF +/- 5% 16 V 0402" CAPC1005X56X25LL10T15 151.61,83.5 r180 top value=100nF (schematic designator C7)
C8 "Capacitor 0.1 uF +/- 5% 16 V 0402" CAPC1005X56X25LL10T15 57.075,161.785 r90 top value=100nF
C9 "Capacitor 10µF +/-40% 6.3V 0402" CAPC0402(1005)60_L 55.075,161.675 r90 top value=10µF
C10 "Capacitor 0.1 uF +/- 5% 16 V 0402" CAPC1005X56X25LL10T15 57.075,158.675 r90 top value=100nF
C11 "Capacitor 0.1 uF +/- 5% 16 V 0402" CAPC1005X56X25LL10T15 81.75,145.5 r90 top value=100nF
C12 "Capacitor 0.1 uF +/- 5% 16 V 0402" CAPC1005X56X25LL10T15 39.175,148.785 r270 top value=100nF
C13 "Capacitor 0.1 uF +/- 5% 16 V 0402" CAPC1005X56X25LL10T15 50.935,152.3 r180 top value=100nF
C14 "Capacitor 0.1 uF +/- 5% 16 V 0402" CAPC1005X56X25LL10T15 117.55,162.615 r270 top value=100nF
C15 "Capacitor 0.1 uF +/- 5% 16 V 0402" CAPC1005X56X25LL10T15 121.96,154.6 r180 top value=100nF
C16 "Capacitor 10µF +/-40% 6.3V 0402" CAPC0402(1005)60_L 119.55,154.625 r180 top value=10µF
C17 "Capacitor 10µF +/-40% 6.3V 0402" CAPC0402(1005)60_L 150.825,149.9 r90 top value=10µF
C18 "Capacitor 0.1 uF +/- 5% 16 V 0402" CAPC1005X56X25LL10T15 150.85,147.85 r90 top value=100nF
C19 "Capacitor 2,2µF +/-20% 10V 0402" CAPC0402(1005)60_L 117.675,159.99 r90 top value=2.2µF
C20 "Capacitor 0.1 uF +/- 5% 16 V 0402" CAPC1005X56X25LL10T15 24.275,151.265 r270 top value=100nF
C21 "Capacitor 10µF +/-40% 6.3V 0402" CAPC0402(1005)60_L 27,151.25 r270 top value=10µF
D1_Bay1 "SS34-E3/57T" FP-95402-MFG 5.5,98.25 r0 top (schematic designator D1)
D1_Bay2 "SS34-E3/57T" FP-95402-MFG 50.5,98.25 r0 top (schematic designator D1)
D1_Bay3 "SS34-E3/57T" FP-95402-MFG 94.25,98.25 r0 top (schematic designator D1)
D1_Bay4 "SS34-E3/57T" FP-95402-MFG 136.75,98.25 r0 top (schematic designator D1)
D2 "SMBJ15A" FP-SMBJ-MFG 151.93,144.3 r0 top
D3 "BZT52C12-13-F" FP-SOD123-MFG 155.625,156.925 r90 top
DS1_Bay1 "LTL-1CHG" LTST-LTL-1CHG-2 31,71.25 r90 top (schematic designator DS1)
DS1_Bay2 "LTL-1CHG" LTST-LTL-1CHG-2 76,71.25 r90 top (schematic designator DS1)
DS1_Bay3 "LTL-1CHG" LTST-LTL-1CHG-2 119.75,71.25 r90 top (schematic designator DS1)
DS1_Bay4 "LTL-1CHG" LTST-LTL-1CHG-2 162.25,71.25 r90 top (schematic designator DS1)
DS2_Bay1 "WP7113SRD/D" KING-WP7113SRDD_V 31.5,78.98 r90 top (schematic designator DS2)
DS2_Bay2 "WP7113SRD/D" KING-WP7113SRDD_V 76.5,78.98 r90 top (schematic designator DS2)
DS2_Bay3 "WP7113SRD/D" KING-WP7113SRDD_V 120.25,78.98 r90 top (schematic designator DS2)
DS2_Bay4 "WP7113SRD/D" KING-WP7113SRDD_V 162.75,78.98 r90 top (schematic designator DS2)
DS3 "LTL-1CHG" LTST-LTL-1CHG-2 144.525,158.85 r90 top
DS5 "LTL-1CHG" LTST-LTL-1CHG-2 8.575,165.675 r0 top
DS6 "WP7113SRD/D" KING-WP7113SRDD_V 9.305,158.675 r0 top
F1 "0451004.MRL" 0451Series_LTF 133.95,149.6 r0 top
J1 "694106301002" 694106301002 136.175,161.15 r180 top
J2 "687118149022" 687118149022 89.5,154.5 r90 top
J3_Bay_holder1 "1043P" FP-1043P-MFG 15.5,43.25 r90 top (schematic designator J3)
J3_Bay_holder2 "1043P" FP-1043P-MFG 57,43.25 r90 top (schematic designator J3)
J3_Bay_holder3 "1043P" FP-1043P-MFG 101,43.14 r90 top (schematic designator J3)
J3_Bay_holder4 "1043P" FP-1043P-MFG 144,43 r90 top (schematic designator J3)
J4 "632723300011" 632723300011 28.345,165.325 r180 top
L1_Bay1 "7447714220" WE-PD_1050P 7,88.25 r90 top (schematic designator L1)
L1_Bay2 "7447714220" WE-PD_1050P 52,88.25 r90 top (schematic designator L1)
L1_Bay3 "7447714220" WE-PD_1050P 95.75,88.25 r90 top (schematic designator L1)
L1_Bay4 "7447714220" WE-PD_1050P 138.25,88.25 r90 top (schematic designator L1)
L2 "LQM2HPN2R2MG0L" INDC2520X100X60NL20T20 121.05,157.665 r270 top value=2.2µH
MD1 "ESP32-WROOM-32E (4MB)" FP-ESP32-WROOM-32E_4MB-MFG 69.575,154.54 r0 top
Q1_Bay1 "2N7002H6327XTSA2" FP-PG-SOT23-3-MFG 15,85 r180 top (schematic designator Q1)
Q1_Bay2 "2N7002H6327XTSA2" FP-PG-SOT23-3-MFG 60,85 r180 top (schematic designator Q1)
Q1_Bay3 "2N7002H6327XTSA2" FP-PG-SOT23-3-MFG 103.75,85 r180 top (schematic designator Q1)
Q1_Bay4 "2N7002H6327XTSA2" FP-PG-SOT23-3-MFG 146.25,85 r180 top (schematic designator Q1)
"Q2_Bay 1_DIS" "IXTP80N075L2" TO254P483X1028X2284-3P 11.931,114.46 r90 top (schematic designator Q2)
"Q2_Bay 2_DIS" "IXTP80N075L2" TO254P483X1028X2284-3P 56.681,114.46 r90 top (schematic designator Q2)
"Q2_Bay 3_DIS" "IXTP80N075L2" TO254P483X1028X2284-3P 100.181,114.71 r90 top (schematic designator Q2)
"Q2_Bay 4_DIS" "IXTP80N075L2" TO254P483X1028X2284-3P 142.581,114.96 r90 top (schematic designator Q2)
Q3 "SS8050-G" FP-SS8050-G-MFG 22.375,141.525 r0 top
Q4 "SS8050-G" FP-SS8050-G-MFG 22.3,145.475 r0 top
R1_Bay1 "10KR2F" RESC0402(1005)_L 31.1,89.775 r90 top value=10k (schematic designator R1)
R1_Bay2 "10KR2F" RESC0402(1005)_L 76.1,89.775 r90 top value=10k (schematic designator R1)
R1_Bay3 "10KR2F" RESC0402(1005)_L 119.85,89.775 r90 top value=10k (schematic designator R1)
R1_Bay4 "10KR2F" RESC0402(1005)_L 162.35,89.775 r90 top value=10k (schematic designator R1)
R2_Bay1 "10KR2F" RESC0402(1005)_L 30,85.55 r90 top value=10k (schematic designator R2)
R2_Bay2 "10KR2F" RESC0402(1005)_L 75,85.55 r90 top value=10k (schematic designator R2)
R2_Bay3 "10KR2F" RESC0402(1005)_L 118.75,85.55 r90 top value=10k (schematic designator R2)
R2_Bay4 "10KR2F" RESC0402(1005)_L 161.25,85.55 r90 top value=10k (schematic designator R2)
R3_Bay1 "100k" FP-RC0805-0_6-MFG 31.25,94.2 r270 top (schematic designator R3)
R3_Bay2 "100k" FP-RC0805-0_6-MFG 76.25,94.2 r270 top (schematic designator R3)
R3_Bay3 "100k" FP-RC0805-0_6-MFG 120,94.2 r270 top (schematic designator R3)
R3_Bay4 "100k" FP-RC0805-0_6-MFG 162.5,94.2 r270 top (schematic designator R3)
R4_Bay1 "1k" FP-RC0805-0_6-MFG 27.25,71 r270 top (schematic designator R4)
R4_Bay2 "1k" FP-RC0805-0_6-MFG 72.25,71 r270 top (schematic designator R4)
R4_Bay3 "1k" FP-RC0805-0_6-MFG 116,71 r270 top (schematic designator R4)
R4_Bay4 "1k" FP-RC0805-0_6-MFG 158.5,71 r270 top (schematic designator R4)
R5_Bay1 "1k" FP-RC0805-0_6-MFG 27.25,78.7 r90 top (schematic designator R5)
R5_Bay2 "1k" FP-RC0805-0_6-MFG 72.25,78.7 r90 top (schematic designator R5)
R5_Bay3 "1k" FP-RC0805-0_6-MFG 116,78.7 r90 top (schematic designator R5)
R5_Bay4 "1k" FP-RC0805-0_6-MFG 158.5,78.7 r90 top (schematic designator R5)
R6_Bay1 "10KR2F" RESC0402(1005)_L 31,98.2 r90 top value=10k (schematic designator R6)
R6_Bay2 "10KR2F" RESC0402(1005)_L 76,98.2 r90 top value=10k (schematic designator R6)
R6_Bay3 "10KR2F" RESC0402(1005)_L 119.75,98.2 r90 top value=10k (schematic designator R6)
R6_Bay4 "10KR2F" RESC0402(1005)_L 162.25,98.2 r90 top value=10k (schematic designator R6)
R7_Bay1 "10k" FP-103AT-2-MFG 15.25,64.5 r0 top (schematic designator R7)
R7_Bay2 "10k" FP-103AT-2-MFG 58.95,64.55 r0 top (schematic designator R7)
R7_Bay3 "10k" FP-103AT-2-MFG 102.075,64.525 r0 top (schematic designator R7)
R7_Bay4 "10k" FP-103AT-2-MFG 144.875,64.5 r0 top (schematic designator R7)
R8_Bay1 "4.53k" RESC1608X55X25LL10T15 27.5,85.5 r90 top (schematic designator R8)
R8_Bay2 "4.53k" RESC1608X55X25LL10T15 72.5,85.5 r90 top (schematic designator R8)
R8_Bay3 "4.53k" RESC1608X55X25LL10T15 116.25,85.5 r90 top (schematic designator R8)
R8_Bay4 "4.53k" RESC1608X55X25LL10T15 158.75,85.5 r90 top (schematic designator R8)
R9_Bay1 "10k" FP-103AT-2-MFG 15.27,53.5 r180 top (schematic designator R9)
R9_Bay2 "10k" FP-103AT-2-MFG 58.97,53.55 r180 top (schematic designator R9)
R9_Bay3 "10k" FP-103AT-2-MFG 102.095,53.525 r180 top (schematic designator R9)
R9_Bay4 "10k" FP-103AT-2-MFG 144.895,53.5 r180 top (schematic designator R9)
R10 "10KR2F" RESC0402(1005)_L 55.075,158.625 r270 top value=10k
R11 "10KR2F" RESC0402(1005)_L 84.25,145.2 r270 top value=10k
R12 "10KR2F" RESC0402(1005)_L 53.075,158.675 r270 top value=10k
"R13_Bay 1_DIS" "1k" FP-RC0805-0_6-MFG 6.731,119.75 r180 top (schematic designator R13)
"R13_Bay 2_DIS" "1k" FP-RC0805-0_6-MFG 51.481,119.75 r180 top (schematic designator R13)
"R13_Bay 3_DIS" "1k" FP-RC0805-0_6-MFG 94.981,120 r180 top (schematic designator R13)
"R13_Bay 4_DIS" "1k" FP-RC0805-0_6-MFG 137.381,120.25 r180 top (schematic designator R13)
"R14_Bay 1_DIS" "Resistor 47K5 +/-1 % 0402 63 mW" RESC0402(1005)_L 6.431,113.8 r90 top value=47.5k (schematic designator R14)
"R14_Bay 2_DIS" "Resistor 47K5 +/-1 % 0402 63 mW" RESC0402(1005)_L 51.181,113.8 r90 top value=47.5k (schematic designator R14)
"R14_Bay 3_DIS" "Resistor 47K5 +/-1 % 0402 63 mW" RESC0402(1005)_L 94.681,114.05 r90 top value=47.5k (schematic designator R14)
"R14_Bay 4_DIS" "Resistor 47K5 +/-1 % 0402 63 mW" RESC0402(1005)_L 137.081,114.3 r90 top value=47.5k (schematic designator R14)
"R15_Bay 1_DIS" "0.2 ohms" BO_CR2512 12.181,127.5 r90 top (schematic designator R15)
"R15_Bay 2_DIS" "0.2 ohms" BO_CR2512 56.931,127.5 r90 top (schematic designator R15)
"R15_Bay 3_DIS" "0.2 ohms" BO_CR2512 100.431,127.75 r90 top (schematic designator R15)
"R15_Bay 4_DIS" "0.2 ohms" BO_CR2512 142.831,128 r90 top (schematic designator R15)
"R16_Bay 1_DIS" "Resistor 100R +/-1 % 0402 63 mW" RESC0402(1005)_L 4.431,113.8 r270 top value="100 ohms" (schematic designator R16)
"R16_Bay 2_DIS" "Resistor 100R +/-1 % 0402 63 mW" RESC0402(1005)_L 49.181,113.8 r270 top value="100 ohms" (schematic designator R16)
"R16_Bay 3_DIS" "Resistor 100R +/-1 % 0402 63 mW" RESC0402(1005)_L 92.681,114.05 r270 top value="100 ohms" (schematic designator R16)
"R16_Bay 4_DIS" "Resistor 100R +/-1 % 0402 63 mW" RESC0402(1005)_L 135.081,114.3 r270 top value="100 ohms" (schematic designator R16)
"R17_Bay 1_DIS" "68m" YAG_R2512_YAG 21.931,123.5 r270 top (schematic designator R17)
"R17_Bay 2_DIS" "68m" YAG_R2512_YAG 66.681,123.5 r270 top (schematic designator R17)
"R17_Bay 3_DIS" "68m" YAG_R2512_YAG 110.181,123.75 r270 top (schematic designator R17)
"R17_Bay 4_DIS" "68m" YAG_R2512_YAG 152.581,124 r270 top (schematic designator R17)
R18 "10KR2F" RESC0402(1005)_L 47.85,152.5 r270 top value=10k
R19 "10KR2F" RESC0402(1005)_L 49,147.675 r0 top value=10k
R20 "10KR2F" RESC0402(1005)_L 56.075,154.225 r270 top value=10k
R21 "Resistor 100k +/-1% 0402 63 mW" RESC1005X40X25ML05T05 54.075,154.175 r180 top value=100k
R22 "100k" FP-RC0805-0_6-MFG 125.55,157.5 r90 top
R23 "1k" FP-RC0805-0_6-MFG 148.775,158.65 r270 top
R24 "Resistor 22K  +/-1 % 0402 63 mW" RESC0402(1005)_L 127.8,159 r90 top value=22k
R25 "10KR2F" RESC0402(1005)_L 151.775,155.1 r90 top value=10k
R26 "0 Ohm" RESC1608X55X25ML10T15 33.45,150 r270 top
R27 "0 Ohm" RESC1608X55X25ML10T15 33.45,153.75 r90 top
R28 "10KR2F" RESC0402(1005)_L 17.325,147.55 r270 top value=10k
R29 "10KR2F" RESC0402(1005)_L 13.925,147.65 r90 top value=10k
R30 "1k" FP-RC0805-0_6-MFG 3.575,165.725 r90 top
R31 "1k" FP-RC0805-0_6-MFG 3.575,157.675 r270 top
R32 "5.1K" FP-RT1206-MFG 35.7,157.925 r270 top value=5.1KΩ
R33 "5.1K" FP-RT1206-MFG 39.775,158.125 r270 top value=5.1KΩ
R34 "10KR2F" RESC0402(1005)_L 13.325,164.425 r90 top value=10k
R35 "22.1K" FP-RT0603-MFG 22,154.5 r0 top value=22.1KΩ
R36 "Resistor 47K5 +/-1 % 0402 63 mW" RESC0402(1005)_L 20.725,152.6 r270 top value=47.5k
R37 "1k" FP-RC0805-0_6-MFG 16.875,164.425 r0 top
R38 "1k" FP-RC0805-0_6-MFG 16.825,167.675 r0 top
R_SHUNT1_Bay1 "68m" YAG_R2512_YAG 28.25,106.75 r270 top (schematic designator R_SHUNT1)
R_SHUNT1_Bay2 "68m" YAG_R2512_YAG 73.25,106.75 r270 top (schematic designator R_SHUNT1)
R_SHUNT1_Bay3 "68m" YAG_R2512_YAG 117,106.75 r270 top (schematic designator R_SHUNT1)
R_SHUNT1_Bay4 "68m" YAG_R2512_YAG 159.5,106.75 r270 top (schematic designator R_SHUNT1)
RS1_Bay1 "68m" YAG_R2512_YAG 14,98.75 r270 top (schematic designator RS1)
RS1_Bay2 "68m" YAG_R2512_YAG 59,98.75 r270 top (schematic designator RS1)
RS1_Bay3 "68m" YAG_R2512_YAG 102.75,98.75 r270 top (schematic designator RS1)
RS1_Bay4 "68m" YAG_R2512_YAG 145.25,98.75 r270 top (schematic designator RS1)
SW1 "1301.9320" FP-1301_9320-MFG 108.8,164.25 r0 top
SW2 "1301.9320" FP-1301_9320-MFG 108.8,155.5 r0 top
U1_Bay1 "INA219BIDCNR" DCN0008A_M 20.5,97.75 r180 top (schematic designator U1)
U1_Bay2 "INA219BIDCNR" DCN0008A_M 65.5,97.75 r180 top (schematic designator U1)
U1_Bay3 "INA219BIDCNR" DCN0008A_M 109.25,97.75 r180 top (schematic designator U1)
U1_Bay4 "INA219BIDCNR" DCN0008A_M 151.75,97.75 r180 top (schematic designator U1)
U2_Bay1 "INA219BIDCNR" DCN0008A_M 20.75,103 r0 top (schematic designator U2)
U2_Bay2 "INA219BIDCNR" DCN0008A_M 65.75,103 r0 top (schematic designator U2)
U2_Bay3 "INA219BIDCNR" DCN0008A_M 109.5,103 r0 top (schematic designator U2)
U2_Bay4 "INA219BIDCNR" DCN0008A_M 152,103 r0 top (schematic designator U2)
U3_Bay1 "TP5100" QFN65P400X400X90-17N 22,88.75 r270 top (schematic designator U3)
U3_Bay2 "TP5100" QFN65P400X400X90-17N 67,88.75 r270 top (schematic designator U3)
U3_Bay3 "TP5100" QFN65P400X400X90-17N 110.75,88.75 r270 top (schematic designator U3)
U3_Bay4 "TP5100" QFN65P400X400X90-17N 153.25,88.75 r270 top (schematic designator U3)
"U4_Bay 1_DIS" "OPA333AIDBVR" FP-DBV0005A-MFG 5.931,125 r90 top (schematic designator U4)
"U4_Bay 2_DIS" "OPA333AIDBVR" FP-DBV0005A-MFG 50.681,125 r90 top (schematic designator U4)
"U4_Bay 3_DIS" "OPA333AIDBVR" FP-DBV0005A-MFG 94.181,125.25 r90 top (schematic designator U4)
"U4_Bay 4_DIS" "OPA333AIDBVR" FP-DBV0005A-MFG 136.581,125.5 r90 top (schematic designator U4)
"U5_Bay 1_DIS" "INA219BIDCNR" DCN0008A_M 16.181,115.5 r270 top (schematic designator U5)
"U5_Bay 2_DIS" "INA219BIDCNR" DCN0008A_M 60.931,115.5 r270 top (schematic designator U5)
"U5_Bay 3_DIS" "INA219BIDCNR" DCN0008A_M 104.431,115.75 r270 top (schematic designator U5)
"U5_Bay 4_DIS" "INA219BIDCNR" DCN0008A_M 146.831,116 r270 top (schematic designator U5)
U6 "ADS1115IDGST" TI-DGS10_M 43.6,150.175 r180 top
U7 "MCP4728T-E/UN" MSOP-UN10_L 53,149.675 r0 top
U8 "PMOS" SO-8L-NB_FAS 144.625,148.785 r180 top
U9 "BUCK CONVERTER" SOT-23-THIN-6_DDC_TEX 121.8,161.75 r0 top
U10 "ESDR0502NMUTBG" ONSC-UDFN-6-517AA-01_V 29.95,152.575 r90 top
U11 "CP2102N-A01-GQFN28" FP-CP2102N-A01-GQFN28-MFG 18.325,159.675 r180 top

## Footprints (in the part's own frame and the unit in brackets; to place one, negate y for a bottom-side part, rotate by r counter-clockwise, add the part's x,y. Pads: shape width x height; smd on the part's side, far side on the other; paste and mask are expansions set on the pad)
0451Series_LTF [mil]
  rect 71x106 smd paste+0 mask+0: 1(-98.5,0) 2(98.5,0)
  Top Layer keep-out region: -59.06,-51 -59.06,51 58.07,51 58.07,-51
  Keep-Out Layer region: -59.06,-53 -59.06,53 58.07,53 58.07,-53
  silkscreen extent -51,-58 51,58, body extent -120,-53 120,53, height 106
632723300011 [mm] "USB 3.1 Type C Receptacle Horizontal THR"
  rect 0.3x1.2 smd: A1(-2.75,5.93) A2(-2.25,5.93) A3(-1.75,5.93) A4(-1.25,5.93) A5(-0.75,5.93) A6(-0.25,5.93) A7(0.25,5.93) A8(0.75,5.93) A9(1.25,5.93) A10(1.75,5.93) A11(2.25,5.93) A12(2.75,5.93)
  round 0.65 hole 0.4: B1(2.8,4.68) B2(2.4,3.98) B3(1.6,3.98) B4(1.2,4.68) B5(0.8,3.98) B6(0.4,4.68) B7(-0.4,4.68) B8(-0.8,3.98) B9(-1.2,4.68) B10(-1.6,3.98) B11(-2.4,3.98) B12(-2.8,4.68) Shell(-2,4.68) Shell(2,4.68)
  oval 1x1.6 hole 0.6 slot 1.2 at 90 deg: Shell(-4.27,3.53) Shell(-4.27,-1.2) Shell(4.27,3.53) Shell(4.27,-1.2)
  rect 0.2x1 smd: Shell(0,1.35) Shell(0,-1.75)
  silkscreen extent -4.37,-4.45 4.34,5, body extent -4.37,-5.62 4.37,6.2, height 3.05
687118149022 [mm] "0.50mm SMT ZIF Horizontal Hinge Type Bottom Contact, 18p"
  rect 0.3x1.3 smd: 1(-4.25,3.35) 2(-3.75,3.35) 3(-3.25,3.35) 4(-2.75,3.35) 5(-2.25,3.35) 6(-1.75,3.35) 7(-1.25,3.35) 8(-0.75,3.35) 9(-0.25,3.35) 10(0.25,3.35) 11(0.75,3.35) 12(1.25,3.35) 13(1.75,3.35) 14(2.25,3.35) 15(2.75,3.35) 16(3.25,3.35) 17(3.75,3.35) 18(4.25,3.35)
  rect 2x1.8 smd: M1(-6.05,0.6) M2(6.05,0.6)
  silkscreen extent -6.63,-2.98 6.63,3.67, body extent -6.55,-2.9 6.55,3.6, height 2.25
694106301002 [mm] "DC Power Jack Right Angled(6.4)"
  rrect50% 4x1.8 hole 0.8 square: 1(0,6.35) 2(0,0.55)
  rrect50% 1.8x4 hole 0.8 square: 3(4.8,3.35)
  silkscreen extent -4.5,-7.25 4.5,7.25, body extent -4.5,-7.25 5,7.25, height 10.75
BO_CR2512 [mil]
  rect 48x130 smd paste+0 mask+0: 1(-118,0) 2(118,0)
  Top Layer keep-out region: -92,-63 -92,63 92,63 92,-63
  Keep-Out Layer region: -92,-65 -92,65 92,65 92,-65
  silkscreen extent -82,-70 82,70, body extent -128,-65 128,65, height 30
CAPC0402(1005)60_L [mm] "Chip Capacitor, Body 1.0x0.5mm, Height 0.6mm, IPC High Density"
  rrect25% 0.5x0.55 smd: 1(-0.45,0) 2(0.45,0)
  silkscreen extent 0,-0.2 0,0.2, body extent -0.5,-0.25 0.5,0.25, height 0.6
CAPC1005X56X25LL10T15 [mm] "Chip Capacitor, 2-Leads, Body 1.10x0.60mm, IPC High Density"
  rect 0.58x0.54 smd: 1(-0.39,0) 2(0.39,0)
  body extent -0.55,-0.3 0.55,0.3, height 0.56
DCN0008A_M [mm] "SOT23, 8-Leads, Body 3x1.75mm, Pitch 0.65mm, IPC Low Density"
  rrect22% 1.2x0.45 smd: 1(-1.475,0.975) 2(-1.475,0.325) 3(-1.475,-0.325) 4(-1.475,-0.975) 5(1.475,-0.975) 6(1.475,-0.325) 7(1.475,0.325) 8(1.475,0.975)
  silkscreen extent -1.6,-1.5 0.5,1.92, body extent -0.88,-1.5 0.87,1.5, height 1.45
FP-103AT-2-MFG [mm]
  rect 1.15x1.15 hole 0.65 paste-2539.97 mask+0: 1(-1.27,0)
  round 1.15 hole 0.65 paste-2539.97 mask+0: 2(1.27,0)
  silkscreen extent -1.85,-1.2 1.85,1.2, body extent -1.95,-1.3 1.95,1.3, height 0.25
FP-1043P-MFG [mm]
  rect 2.02x2.02 hole 1.32 paste-2539.97 mask+0: 1(-36.11,0)
  round 2.02 hole 1.32 paste-2539.97 mask+0: 2(36.11,0)
  round 3.55 hole 3.55 unplated paste-2539.97 mask+0: ""(-27.6,-8) ""(27.6,8)
  round 2.39 hole 2.39 unplated paste-2539.97 mask+0: ""(35.8,-8)
  silkscreen extent -39.95,-10.45 39.95,10.45, body extent -38.75,-10.55 38.75,10.55, height 0.25
FP-1301_9320-MFG [mm]
  rect 2.1x1.4 smd paste+0 mask+0: 1(-5,2.25) 2(5,2.25) 3(-5,-2.25) 4(5,-2.25)
  silkscreen extent -6.72,-3 3,3, body extent -6.15,-3.1 6.15,3.1, height 0.25
FP-95402-MFG [mm]
  rect 1.72x3.2 smd paste+0 mask+0: 1(-3.205,0) 2(3.205,0)
  silkscreen extent -4.82,-3.11 3.55,3.11, body extent -4.17,-3.21 4.17,3.21, height 0.25
FP-CP2102N-A01-GQFN28-MFG [mm]
  round 0.27 smd paste+0 mask+0: 1(-2.4,1.5) 2(-2.4,1) 3(-2.4,0.5) 4(-2.725,0) 5(-2.4,-0.5) 6(-2.4,-1) 7(-2.4,-1.5) 8(-1.5,-2.4) 9(-1,-2.4) 10(-0.5,-2.416) 11(0,-2.416) 12(0.5,-2.4) 13(1,-2.4) 14(1.5,-2.4) 15(2.4,-1.5) 16(2.4,-1) 17(2.4,-0.5) 18(2.675,0) 19(2.4,0.5) 20(2.4,1) 21(2.4,1.5) 22(1.5,2.4) 23(1,2.4) 24(0.5,2.416) 25(0,2.416) 26(-0.5,2.4) 27(-1,2.4) 28(-1.5,2.4)
  rect 3.35x3.35 smd paste-1000 mask+0: 29(0,0)
  Top Layer region: -2.875,0.65 -2.075,0.65 -2.018,0.639 -1.969,0.606 -1.936,0.557 -1.925,0.5 -1.925,0.5 -1.936,0.443 -1.969,0.394 -2.018,0.361 -2.075,0.35 -2.075,0.35 -2.875,0.35
  Top Layer region: -2.875,-0.85 -2.075,-0.85 -2.018,-0.861 -1.969,-0.894 -1.936,-0.943 -1.925,-1 -1.925,-1 -1.936,-1.057 -1.969,-1.106 -2.018,-1.139 -2.075,-1.15 -2.075,-1.15 -2.875,-1.15
  Top Layer region: -2.875,-1.35 -2.075,-1.35 -2.018,-1.361 -1.969,-1.394 -1.936,-1.443 -1.925,-1.5 -1.925,-1.5 -1.936,-1.557 -1.969,-1.606 -2.018,-1.639 -2.075,-1.65 -2.075,-1.65 -2.875,-1.65
  Top Layer region: -2.875,1.65 -2.075,1.65 -2.018,1.639 -1.969,1.606 -1.936,1.557 -1.925,1.5 -1.925,1.5 -1.936,1.443 -1.969,1.394 -2.018,1.361 -2.075,1.35 -2.075,1.35 -2.875,1.35
  Top Layer region: -2.875,1.15 -2.075,1.15 -2.018,1.139 -1.969,1.106 -1.936,1.057 -1.925,1 -1.925,1 -1.936,0.943 -1.969,0.894 -2.018,0.861 -2.075,0.85 -2.075,0.85 -2.875,0.85
  Top Layer region: -0.65,-2.875 -0.65,-2.075 -0.639,-2.018 -0.606,-1.969 -0.557,-1.936 -0.5,-1.925 -0.5,-1.925 -0.443,-1.936 -0.394,-1.969 -0.361,-2.018 -0.35,-2.075 -0.35,-2.075 -0.35,-2.875
  Top Layer region: 0.35,-2.875 0.35,-2.075 0.361,-2.018 0.394,-1.969 0.443,-1.936 0.5,-1.925 0.5,-1.925 0.557,-1.936 0.606,-1.969 0.639,-2.018 0.65,-2.075 0.65,-2.075 0.65,-2.875
  Top Layer region: 0.85,-2.875 0.85,-2.075 0.861,-2.018 0.894,-1.969 0.943,-1.936 1,-1.925 1,-1.925 1.057,-1.936 1.106,-1.969 1.139,-2.018 1.15,-2.075 1.15,-2.075 1.15,-2.875
  Top Layer region: 1.35,-2.875 1.35,-2.075 1.361,-2.018 1.394,-1.969 1.443,-1.936 1.5,-1.925 1.5,-1.925 1.557,-1.936 1.606,-1.969 1.639,-2.018 1.65,-2.075 1.65,-2.075 1.65,-2.875
  Top Layer region: 2.875,-1.65 2.075,-1.65 2.018,-1.639 1.969,-1.606 1.936,-1.557 1.925,-1.5 1.925,-1.5 1.936,-1.443 1.969,-1.394 2.018,-1.361 2.075,-1.35 2.075,-1.35 2.875,-1.35
  Top Layer region: 2.875,-1.15 2.075,-1.15 2.018,-1.139 1.969,-1.106 1.936,-1.057 1.925,-1 1.925,-1 1.936,-0.943 1.969,-0.894 2.018,-0.861 2.075,-0.85 2.075,-0.85 2.875,-0.85
  Top Layer region: 2.875,-0.65 2.075,-0.65 2.018,-0.639 1.969,-0.606 1.936,-0.557 1.925,-0.5 1.925,-0.5 1.936,-0.443 1.969,-0.394 2.018,-0.361 2.075,-0.35 2.075,-0.35 2.875,-0.35
  Top Layer region: 2.875,-0.15 2.075,-0.15 2.018,-0.139 1.969,-0.106 1.936,-0.057 1.925,0 1.925,0 1.936,0.057 1.969,0.106 2.018,0.139 2.075,0.15 2.075,0.15 2.875,0.15
  Top Layer region: 2.875,0.85 2.075,0.85 2.018,0.861 1.969,0.894 1.936,0.943 1.925,1 1.925,1 1.936,1.057 1.969,1.106 2.018,1.139 2.075,1.15 2.075,1.15 2.875,1.15
  Top Layer region: 2.875,1.35 2.075,1.35 2.018,1.361 1.969,1.394 1.936,1.443 1.925,1.5 1.925,1.5 1.936,1.557 1.969,1.606 2.018,1.639 2.075,1.65 2.075,1.65 2.875,1.65
  Top Layer region: 1.65,2.875 1.65,2.075 1.639,2.018 1.606,1.969 1.557,1.936 1.5,1.925 1.5,1.925 1.443,1.936 1.394,1.969 1.361,2.018 1.35,2.075 1.35,2.075 1.35,2.875
  Top Layer region: 1.15,2.875 1.15,2.075 1.139,2.018 1.106,1.969 1.057,1.936 1,1.925 1,1.925 0.943,1.936 0.894,1.969 0.861,2.018 0.85,2.075 0.85,2.075 0.85,2.875
  Top Layer region: -0.85,2.875 -0.85,2.075 -0.861,2.018 -0.894,1.969 -0.943,1.936 -1,1.925 -1,1.925 -1.057,1.936 -1.106,1.969 -1.139,2.018 -1.15,2.075 -1.15,2.075 -1.15,2.875
  Top Layer region: -0.15,-2.875 -0.15,-2.075 -0.139,-2.018 -0.106,-1.969 -0.057,-1.936 0,-1.925 0,-1.925 0.057,-1.936 0.106,-1.969 0.139,-2.018 0.15,-2.075 0.15,-2.075 0.15,-2.875
  Top Layer region: 2.875,0.35 2.075,0.35 2.018,0.361 1.969,0.394 1.936,0.443 1.925,0.5 1.925,0.5 1.936,0.557 1.969,0.606 2.018,0.639 2.075,0.65 2.075,0.65 2.875,0.65
  Top Layer region: -1.15,-2.875 -1.15,-2.075 -1.139,-2.018 -1.106,-1.969 -1.057,-1.936 -1,-1.925 -1,-1.925 -0.943,-1.936 -0.894,-1.969 -0.861,-2.018 -0.85,-2.075 -0.85,-2.075 -0.85,-2.875
  Top Layer region: -1.65,-2.875 -1.65,-2.075 -1.639,-2.018 -1.606,-1.969 -1.557,-1.936 -1.5,-1.925 -1.5,-1.925 -1.443,-1.936 -1.394,-1.969 -1.361,-2.018 -1.35,-2.075 -1.35,-2.075 -1.35,-2.875
  Top Layer region: -2.875,0.15 -2.075,0.15 -2.018,0.139 -1.969,0.106 -1.936,0.057 -1.925,0 -1.925,0 -1.936,-0.057 -1.969,-0.106 -2.018,-0.139 -2.075,-0.15 -2.075,-0.15 -2.875,-0.15
  Top Layer region: -0.35,2.875 -0.35,2.075 -0.361,2.018 -0.394,1.969 -0.443,1.936 -0.5,1.925 -0.5,1.925 -0.557,1.936 -0.606,1.969 -0.639,2.018 -0.65,2.075 -0.65,2.075 -0.65,2.875
  Top Layer region: -2.875,-0.35 -2.075,-0.35 -2.018,-0.361 -1.969,-0.394 -1.936,-0.443 -1.925,-0.5 -1.925,-0.5 -1.936,-0.557 -1.969,-0.606 -2.018,-0.639 -2.075,-0.65 -2.075,-0.65 -2.875,-0.65
  Top Layer region: 0.65,2.875 0.65,2.075 0.639,2.018 0.606,1.969 0.557,1.936 0.5,1.925 0.5,1.925 0.443,1.936 0.394,1.969 0.361,2.018 0.35,2.075 0.35,2.075 0.35,2.875
  Top Layer region: -1.35,2.875 -1.35,2.075 -1.361,2.018 -1.394,1.969 -1.443,1.936 -1.5,1.925 -1.5,1.925 -1.557,1.936 -1.606,1.969 -1.639,2.018 -1.65,2.075 -1.65,2.075 -1.65,2.875
  Top Layer region: 0.15,2.875 0.15,2.075 0.139,2.018 0.106,1.969 0.057,1.936 0,1.925 0,1.925 -0.057,1.936 -0.106,1.969 -0.139,2.018 -0.15,2.075 -0.15,2.075 -0.15,2.875
  silkscreen extent -3.58,-2.55 2.55,2.55, body extent -2.98,-2.98 2.98,2.98, height 0.25
FP-DBV0005A-MFG [mm]
  rrect17% 1.1x0.6 smd paste+0 mask+0: 1(-1.3,0.95) 2(-1.3,0) 3(-1.3,-0.95) 4(1.3,-0.95) 5(1.3,0.95)
  silkscreen extent -2.57,-1.53 0.87,1.53, body extent -1.95,-1.78 1.95,1.78, height 0.25
FP-ESP32-WROOM-32E_4MB-MFG [mm]
  rect 1.5x0.9 smd paste+0 mask+0: 1(-8.75,5.26) 2(-8.75,3.99) 3(-8.75,2.72) 4(-8.75,1.45) 5(-8.75,0.18) 6(-8.75,-1.09) 7(-8.75,-2.36) 8(-8.75,-3.63) 9(-8.75,-4.9) 10(-8.75,-6.17) 11(-8.75,-7.44) 12(-8.75,-8.71) 13(-8.75,-9.98) 14(-8.75,-11.25) 25(8.75,-11.25) 26(8.75,-9.98) 27(8.75,-8.71) 28(8.75,-7.44) 29(8.75,-6.17) 30(8.75,-4.9) 31(8.75,-3.63) 32(8.75,-2.36) 33(8.75,-1.09) 34(8.75,0.18) 35(8.75,1.45) 36(8.75,2.72) 37(8.75,3.99) 38(8.75,5.26)
  rect 0.9x1.5 smd paste+0 mask+0: 15(-5.71,-12.5) 16(-4.44,-12.5) 17(-3.17,-12.5) 18(-1.9,-12.5) 19(-0.63,-12.5) 20(0.64,-12.5) 21(1.91,-12.5) 22(3.18,-12.5) 23(4.45,-12.5) 24(5.72,-12.5)
  rect 0.9x0.9 smd paste+0 mask+0: 39(-2.9,-3.86) 39(-2.9,-2.46) 39(-2.9,-1.06) 39(-1.5,-3.86) 39(-1.5,-2.46) 39(-1.5,-1.06) 39(-0.1,-3.86) 39(-0.1,-2.46) 39(-0.1,-1.06)
  Keep-Out Layer region: -9,6.205 9,6.205 9,12.395 -9,12.395
  Keep-Out Layer region: -9,6.205 9,6.205 9,12.395 -9,12.395
  silkscreen extent -10.2,-12.83 9.07,12.83, body extent -9.6,-13.35 9.6,12.93, height 0.25
FP-PG-SOT23-3-MFG [mm]
  rect 0.9x0.8 smd paste+0 mask+0: 1(-1.1,1) 2(-1.1,-1) 3(1.1,0)
  silkscreen extent -0.28,-1.5 0.7,1.5, body extent -1.65,-1.6 1.65,1.6, height 0.25
FP-RC0805-0_6-MFG [mm]
  rect 0.9x1.2 smd paste+0 mask+0: 1(-1.05,0) 2(1.05,0)
  silkscreen extent -0.23,-0.68 0.22,0.68, body extent -1.6,-0.77 1.6,0.77, height 0.25
FP-RT0603-MFG [mm]
  rect 0.9x0.8 smd paste+0 mask+0: 1(-0.85,0) 2(0.85,0)
  silkscreen extent -0.85,-0.81 0.86,0.8, body extent -1.4,-0.55 1.4,0.55, height 0.25
FP-RT1206-MFG [mm]
  rect 1x1.5 smd paste+0 mask+0: 1(-1.6,0) 2(1.6,0)
  silkscreen extent -0.73,-0.85 0.73,0.85, body extent -2.2,-0.95 2.2,0.95, height 0.25
FP-SMBJ-MFG [mm]
  rect 1.27x2.1 smd paste+0 mask+0: 1(-1.98,0) 2(1.98,0)
  silkscreen extent -3.32,-1.97 2.28,1.97, body extent -2.72,-2.07 2.72,2.07, height 0.25
FP-SOD123-MFG [mm]
  rect 0.9x0.95 smd paste+0 mask+0: 1(-1.575,0) 2(1.575,0)
  silkscreen extent -2.82,-0.85 0.75,0.85, body extent -2.12,-0.95 2.12,0.95, height 0.25
FP-SS8050-G-MFG [mm]
  rect 0.8x0.6 smd paste+0 mask+0: 1(-1.01,0.95) 2(-1.01,-0.95) 3(1.01,0)
  silkscreen extent -0.7,-1.5 0.7,1.5, body extent -1.51,-1.6 1.51,1.6, height 0.25
INDC2520X100X60NL20T20 [mm] "Chip Inductor, 2-Leads, Body 2.7x2.2mm, IPC Medium Density"
  rect 1.23x2.22 smd: 1(-1.085,0) 2(1.085,0)
  silkscreen extent -0.1,-1.01 0.1,1.01, body extent -1.35,-1.1 1.35,1.1, height 1
KING-WP7113SRDD_V [mm] "THD, 2-Leads, Dia 5.9mm, Body Length 8.6mm"
  rect 1.4x1.4 hole 0.889: 1(-1.27,0)
  round 1.4 hole 0.889: 2(1.27,0)
  silkscreen extent -2.95,-2.95 2.95,2.95, body extent -2.95,-2.95 2.5,2.95, height 15.5
LTST-LTL-1CHG-2 [mm] "TH, 2-Leads, Dia 3.8mm"
  rect 1.4x1.4 hole 0.9: 1(-1.27,0)
  round 1.4 hole 0.9: 2(1.27,0)
  silkscreen extent -2.87,-0.25 -2.37,0.25, body extent -1.9,-1.9 1.9,1.9, height 6.5
MSOP-UN10_L [mm] "TSSOP, 10-Leads, Body 3x3mm, Pitch 0.5mm, IPC High Density"
  oval 1.45x0.25 smd: 1(-2.025,1) 2(-2.025,0.5) 3(-2.025,0) 4(-2.025,-0.5) 5(-2.025,-1) 6(2.025,-1) 7(2.025,-0.5) 8(2.025,0) 9(2.025,0.5) 10(2.025,1)
  silkscreen extent -2.15,-1.55 0.9,1.8, body extent -1.55,-1.55 1.55,1.55, height 1.1
ONSC-UDFN-6-517AA-01_V [mm] "SON, 6-Leads, Body 1.2x1mm, Pitch 0.4mm"
  rrect50% 0.42x0.2 smd: 1(-0.325,0.4) 2(-0.325,0) 3(-0.325,-0.4) 4(0.325,-0.4) 5(0.325,0) 6(0.325,0.4)
  silkscreen extent -0.8,-0.9 0.8,0.9, body extent -0.5,-0.6 0.5,0.6, height 0.55
QFN65P400X400X90-17N [mm]
  rrect25% 1.01x0.32 smd: 1(-1.86,0.975) 2(-1.86,0.325) 3(-1.86,-0.325) 4(-1.86,-0.975) 9(1.86,-0.975) 10(1.86,-0.325) 11(1.86,0.325) 12(1.86,0.975)
  rrect25% 0.32x1.01 smd: 5(-0.975,-1.86) 6(-0.325,-1.86) 7(0.325,-1.86) 8(0.975,-1.86) 13(0.975,1.86) 14(0.325,1.86) 15(-0.325,1.86) 16(-0.975,1.86)
  rect 2.1x2.1 smd paste-0.39: 17(0,0)
  silkscreen extent -3.17,-2 2,2, body extent -2,-2 2,2, height 0.9
RESC0402(1005)_L [mm] "Chip Resistor, Body 1.0x0.5mm, IPC High Density"
  rrect25% 0.5x0.55 smd: 1(-0.45,0) 2(0.45,0)
  silkscreen extent 0,-0.2 0,0.2, body extent -0.5,-0.25 0.5,0.25, height 0.3
RESC1005X40X25ML05T05 [mm] "Chip Resistor, 2-Leads, Body 1.05x0.55mm, IPC Low Density"
  rect 0.65x0.65 smd: 1(-0.5,0) 2(0.5,0)
  body extent -0.53,-0.28 0.53,0.28, height 0.4
RESC1608X55X25LL10T15 [mm] "Chip Resistor, 2-Leads, Body 1.60x0.80mm, IPC High Density"
  rect 0.6x0.8 smd: 1(-0.65,0) 2(0.65,0)
  body extent -0.85,-0.45 0.85,0.45, height 0.55
RESC1608X55X25ML10T15 [mm] "Chip Resistor, 2-Leads, Body 1.60x0.80mm, IPC Low Density"
  rect 0.8x1 smd: 1(-0.75,0) 2(0.75,0)
  body extent -0.85,-0.45 0.85,0.45, height 0.55
SO-8L-NB_FAS [mil]
  rect 69x26 smd paste+0 mask+0: 1(-110.24,75)
  oval 69x26 smd paste+0 mask+0: 2(-110.24,25) 3(-110.24,-25) 4(-110.24,-75) 5(110.24,-75) 6(110.24,-25) 7(110.24,25) 8(110.24,75)
  silkscreen extent -84,-104 83,103, body extent -131,-99 131,99, height 69
SOT-23-THIN-6_DDC_TEX [mm]
  rect 0.998x0.558 smd paste+0 mask+0: 1(-1.375,0.95) 2(-1.375,0) 3(-1.375,-0.95) 4(1.375,-0.95) 5(1.375,0) 6(1.375,0.95)
  silkscreen extent -1,-1.65 1,1.65, body extent -1.52,-1.52 1.52,1.52, height 1.09
TI-DGS10_M [mm] "SOP, 10-Leads, Body 3x3mm, Pitch 0.5mm, IPC Low Density"
  oval 2x0.3 smd: 1(-2.1,1) 2(-2.1,0.5) 3(-2.1,0) 4(-2.1,-0.5) 5(-2.1,-1) 6(2.1,-1) 7(2.1,-0.5) 8(2.1,0) 9(2.1,0.5) 10(2.1,1)
  silkscreen extent -2.23,-1.55 0.7,1.82, body extent -1.55,-1.55 1.55,1.55, height 1.1
TO254P483X1028X2284-3P [mm]
  rect 2.04x2.04 / inner round 2.04 / far side rect 2.04x2.04 hole 1.36: 1(0,0)
  round 2.04 hole 1.36: 2(2.54,0) 3(5.08,0)
  silkscreen extent -2.79,-1.76 7.87,3.07
WE-PD_1050P [mm] "SMD Shielded Power Inductor, 2-leads, body 10x10mm"
  rect 3.5x2 smd: 1(0,4.5) 2(0,-4.5)
  Top Layer keep-out region: 5,-5 1.95,-5 1.95,-3.3 -1.95,-3.3 -1.95,-5 -5,-5 -5,5 -1.95,5 -1.95,3.3 1.95,3.3 1.95,5 5,5
  silkscreen extent -5.15,-5.25 5.15,6.07, body extent -5,-5 5,5, height 4.79
YAG_R2512_YAG [mil]
  rect 36x132 smd paste+0 mask+0: 1(-117,0) 2(117,0)
  Top Layer keep-out region: -97,-64 -97,64 97,64 97,-64
  Keep-Out Layer region: -97,-66 -97,66 97,66 97,-66
  silkscreen extent -87,-71 87,71, body extent -127,-66 127,66, height 26